# Altium PCB PCB1.PcbDoc (part 1 of 2)
Units mm, origin at the board's own origin, x right, y up, seen from the top; angles counter-clockwise.
Board outline 84.97 x 56 mm, 6 copper layers (Top Layer, L2_GND, L3-PWR, L4-SGN, L5-GND, Bottom Layer), stack 1.452 mm thick; 132 components, 108 nets, 851 pads, 433 vias.
Unrouted connection lines stored in the file: 212.
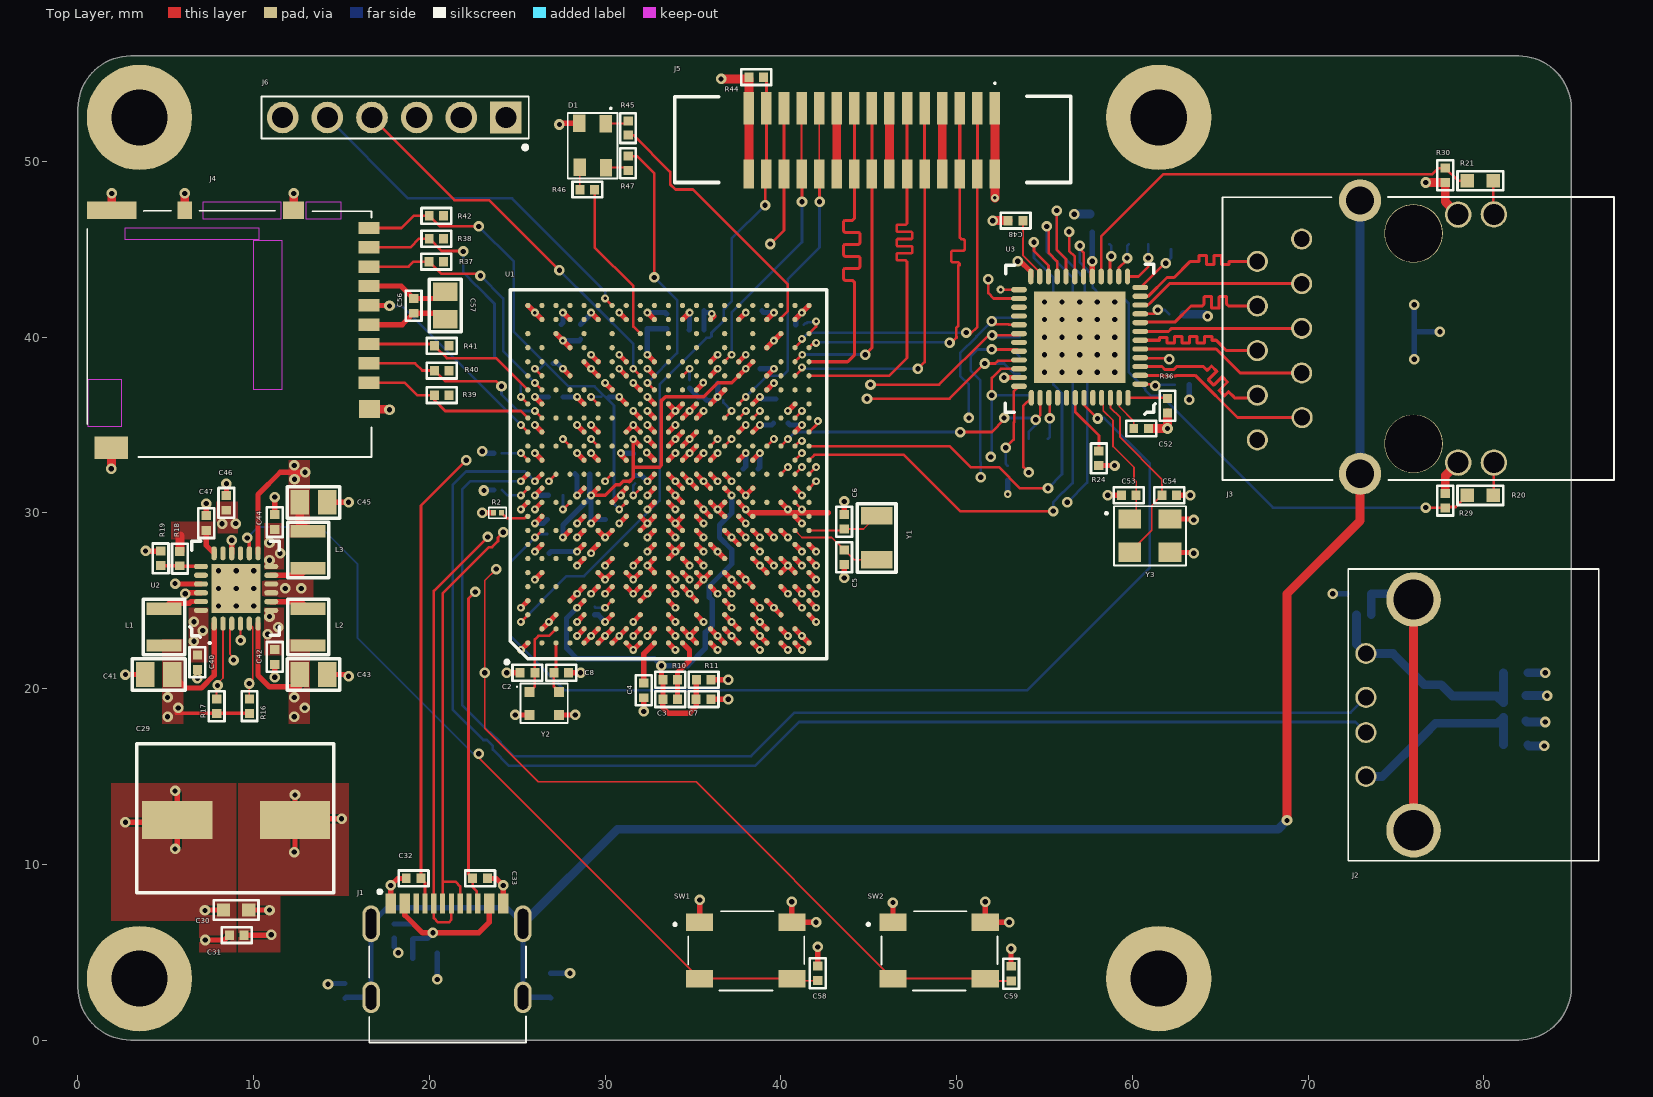
[diagram p0: Top Layer view]
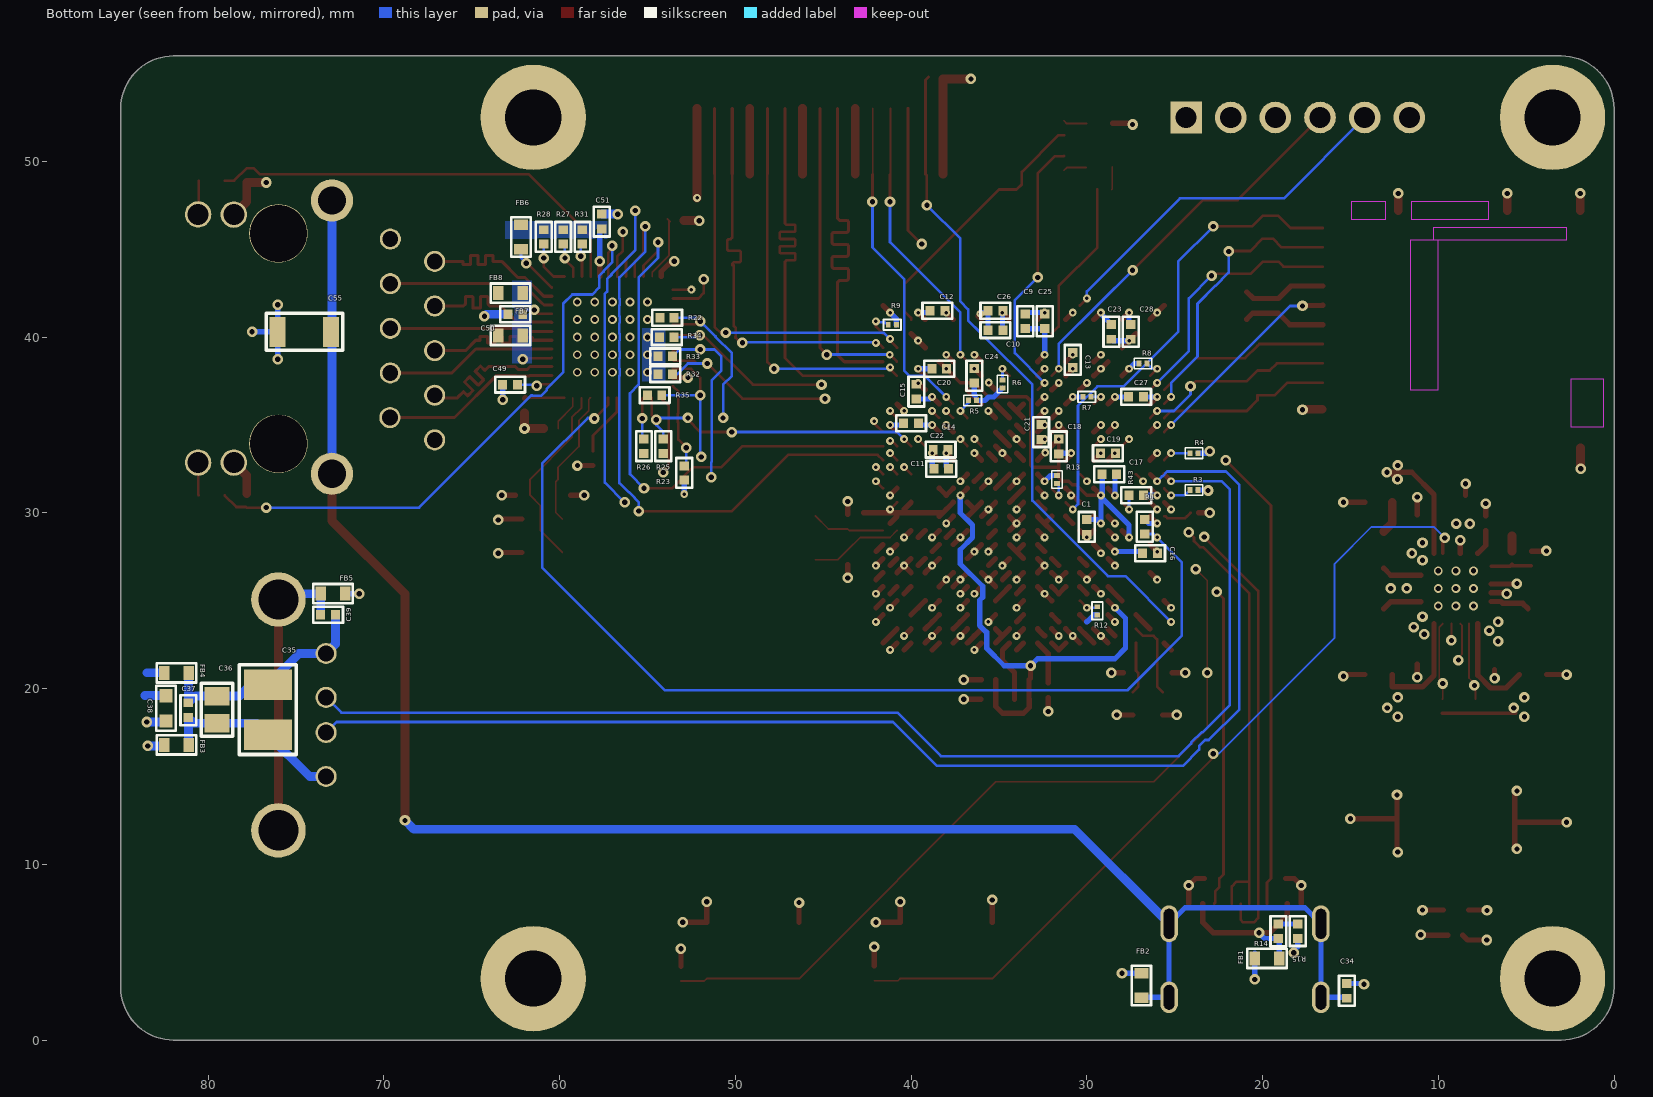
[diagram p1: Bottom Layer view, seen from below]
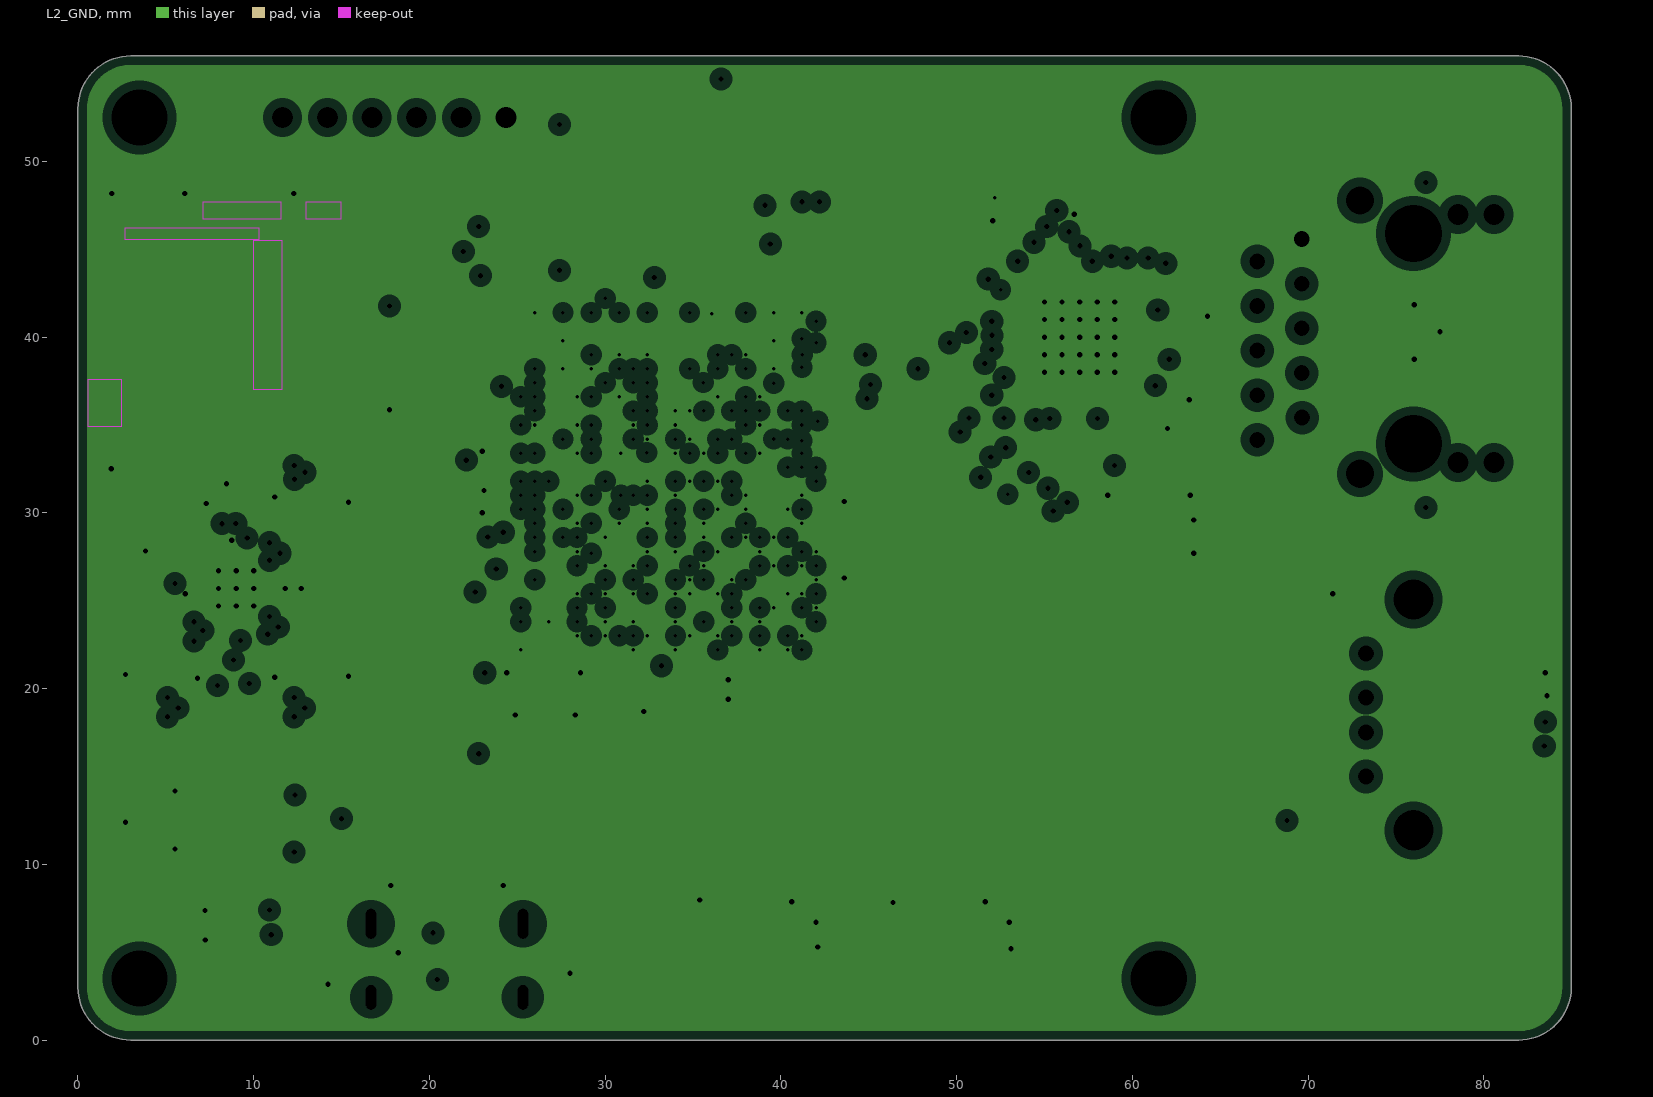
[diagram p2: L2_GND, clearances drawn from the general rule]
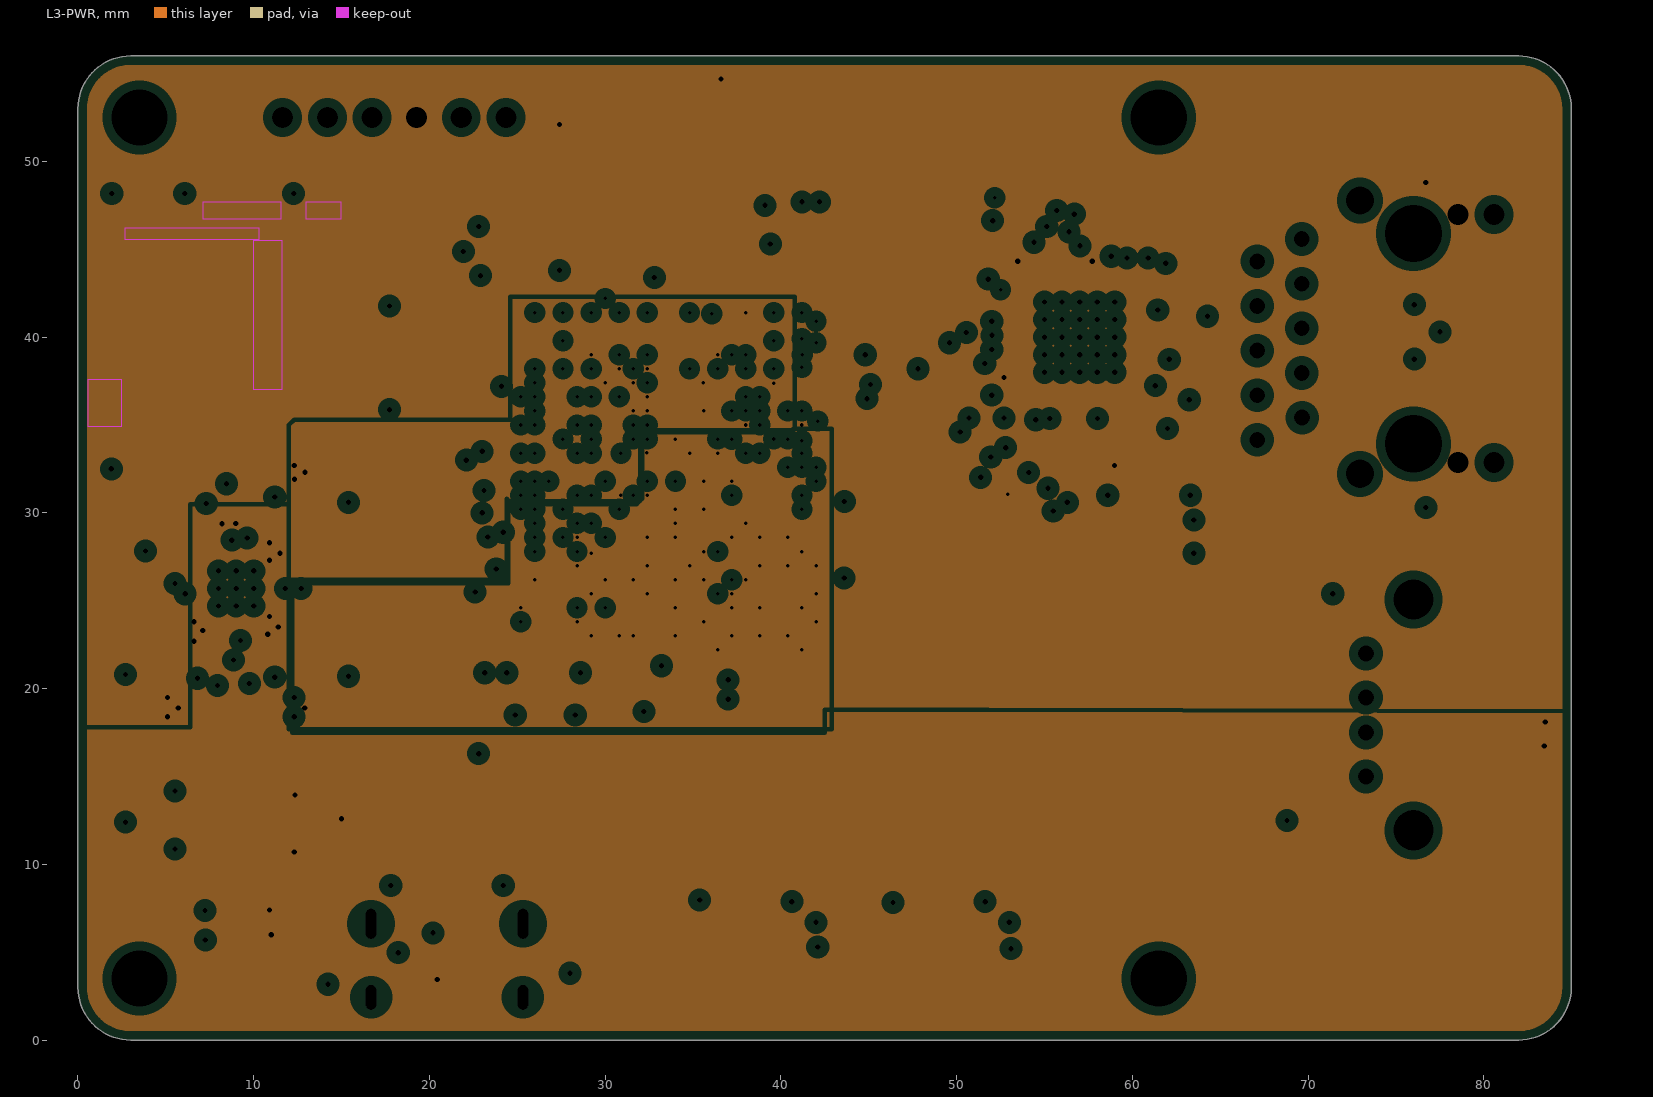
[diagram p3: L3-PWR, clearances drawn from the general rule]
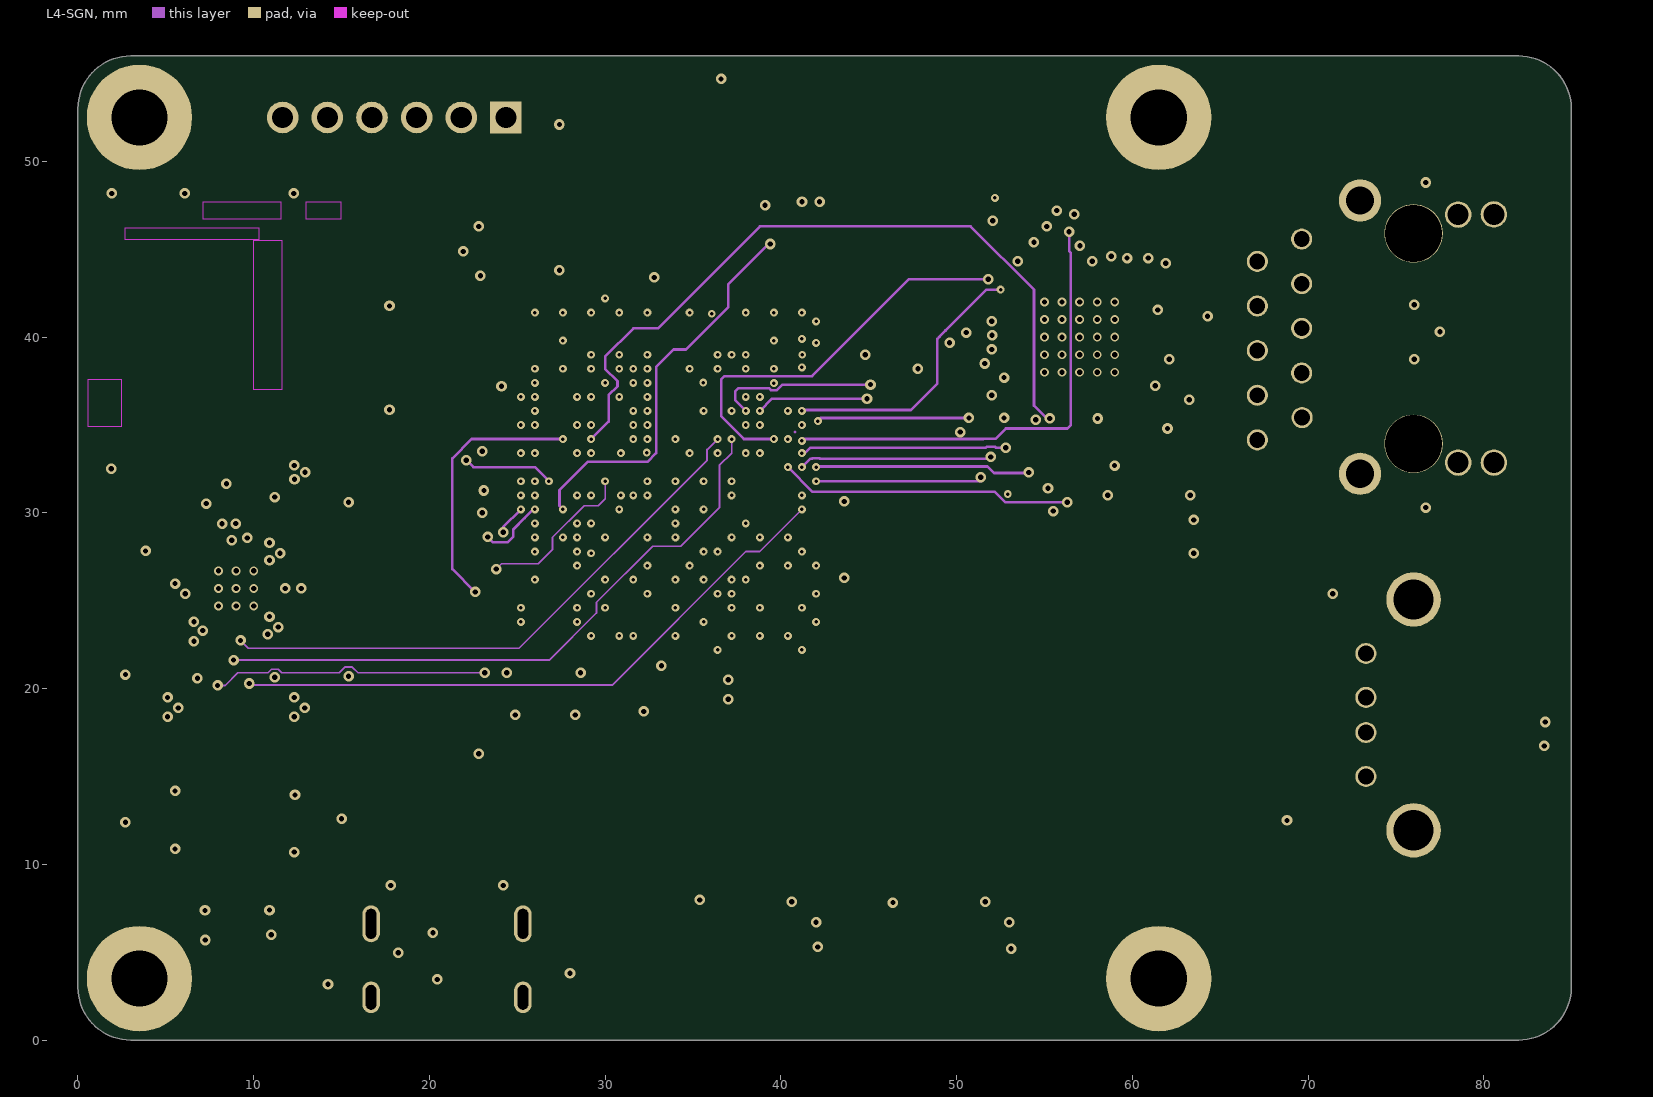
[diagram p4: L4-SGN]
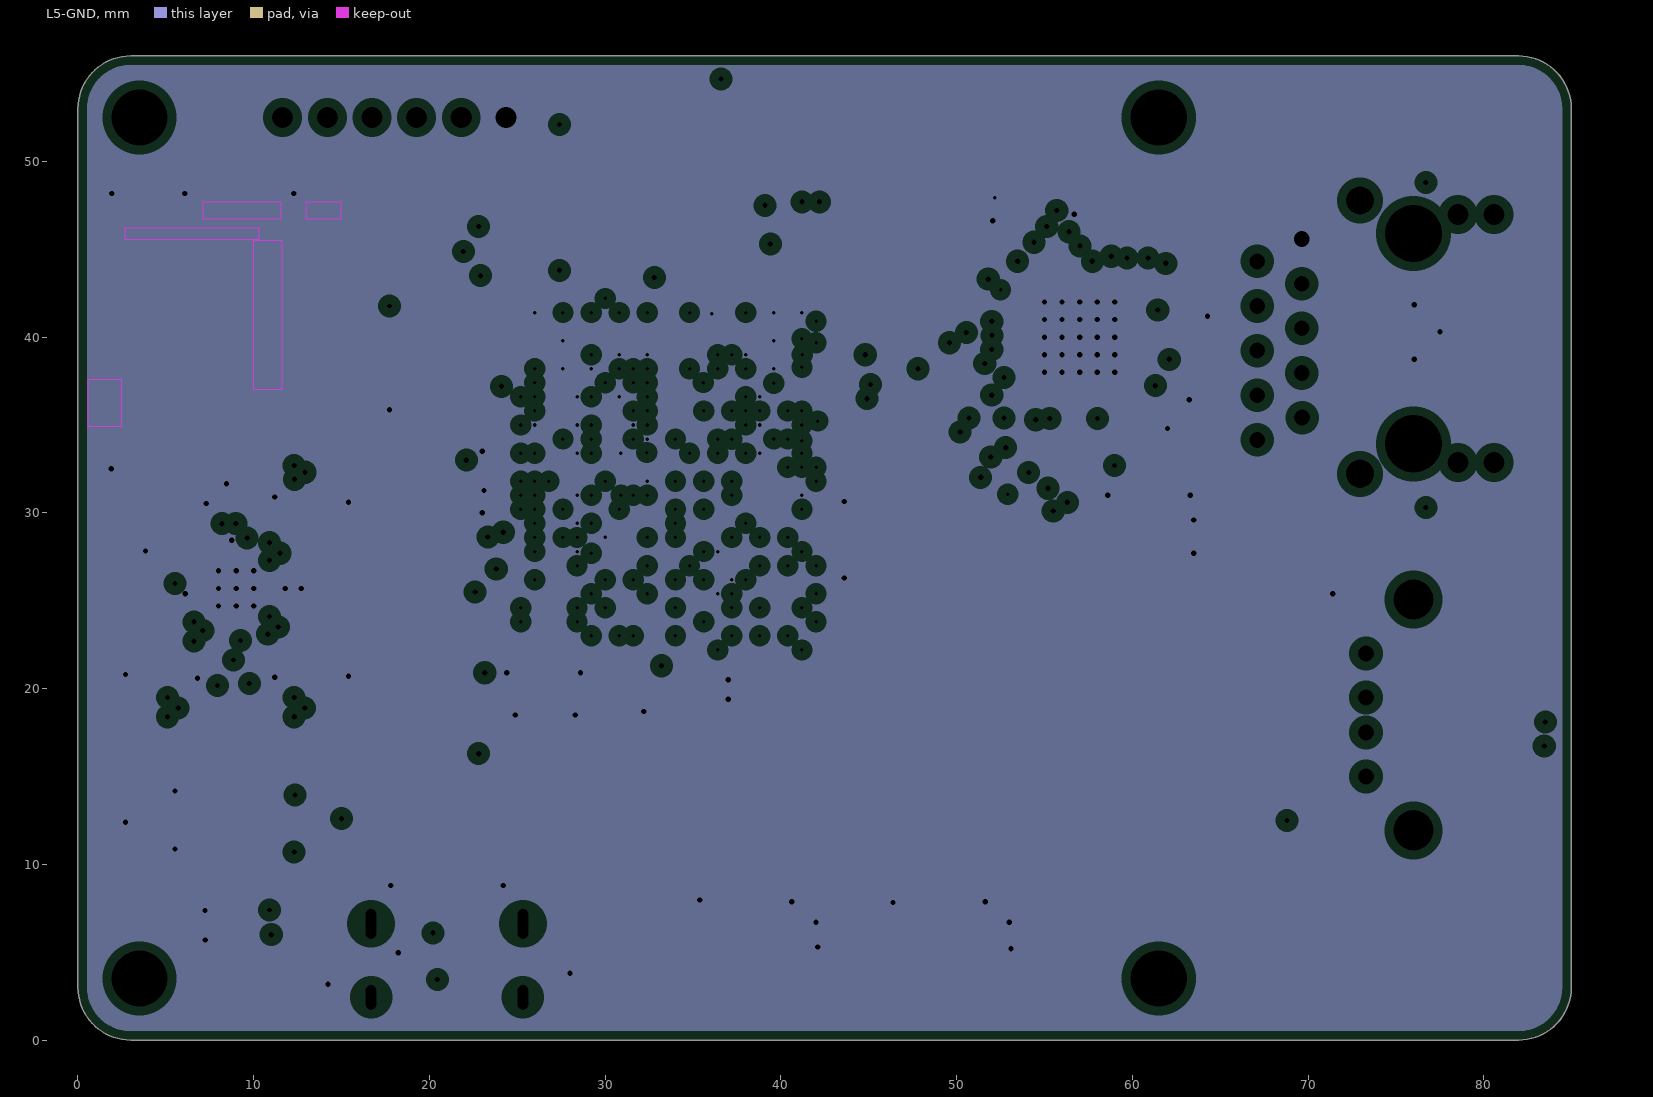
[diagram p5: L5-GND, clearances drawn from the general rule]
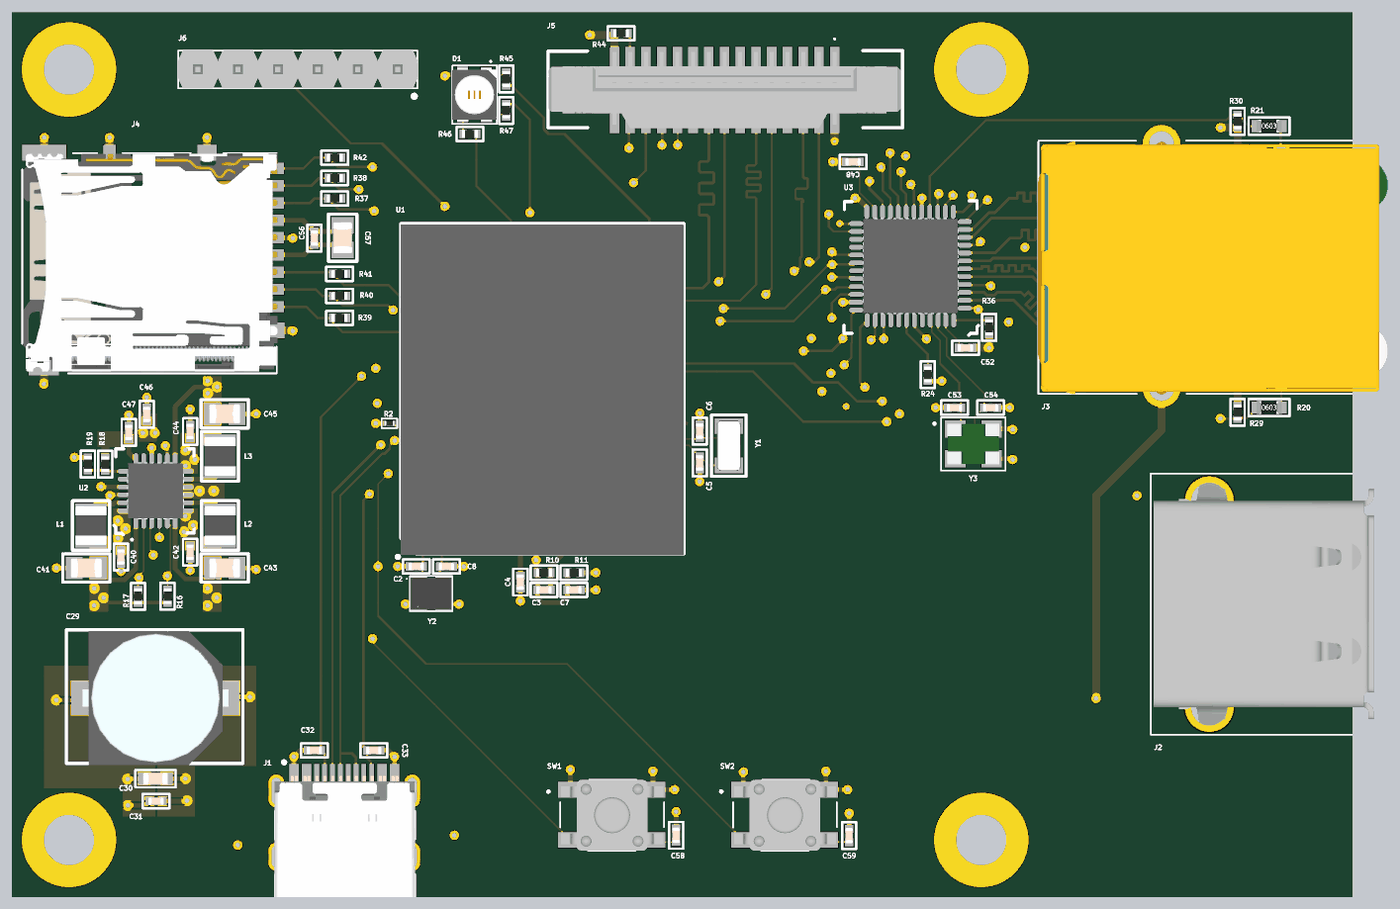
[diagram p7: 3D render of the assembled board from above, using the file's embedded part models]
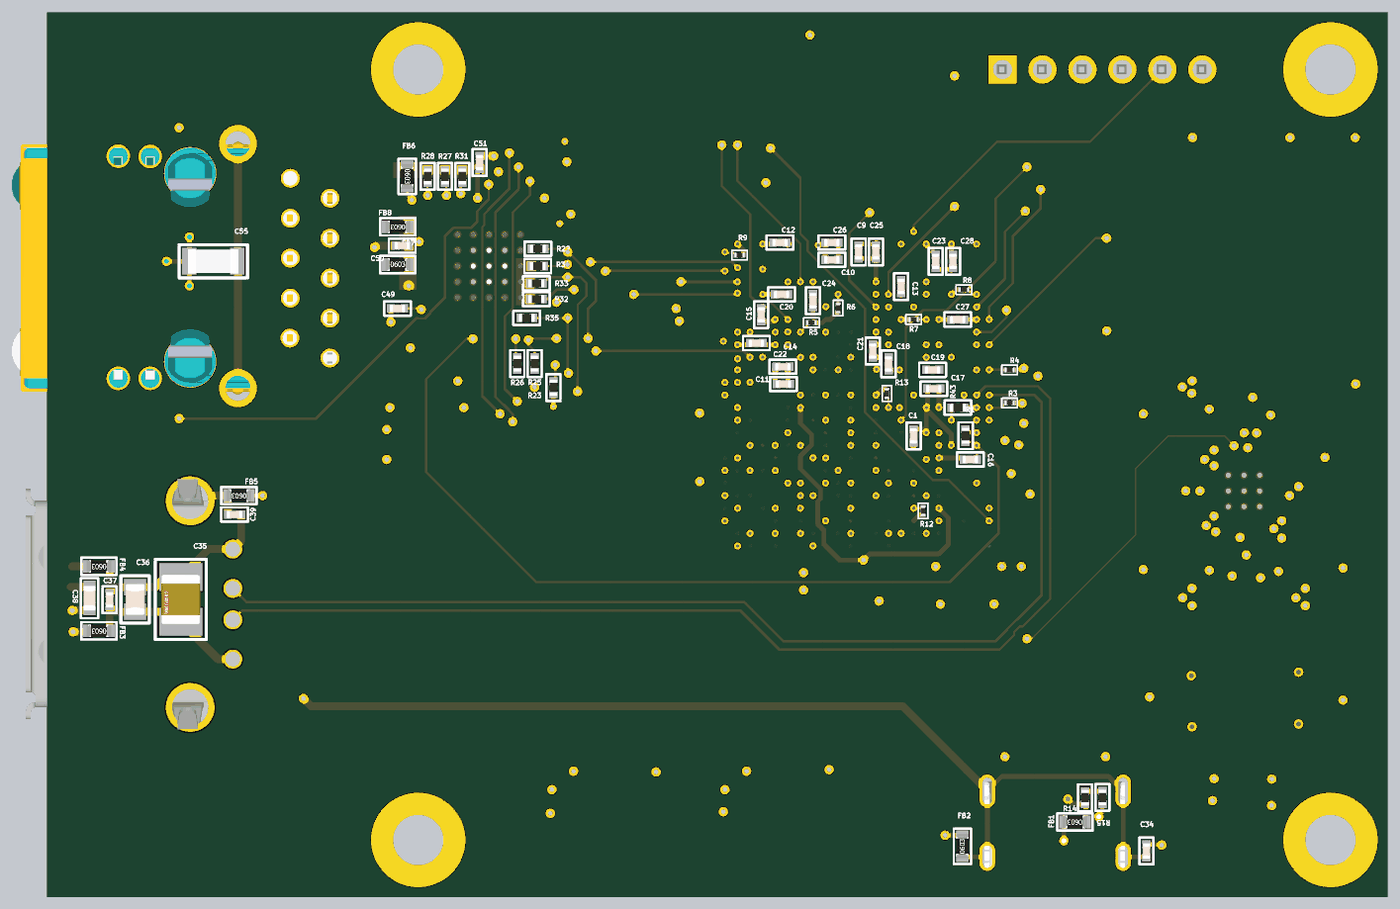
[diagram p8: 3D render of the assembled board from below, using the file's embedded part models]

## Layer stack, top to bottom
Top Solder: solder mask 0.01, Solder Resist, Dk 3.5
Top Layer: signal copper 0.035
Dielectric 1: prepreg 0.1, PP-006, Dk 4.1
L2_GND: plane copper 0.018, net GND
Dielectric 2: core 0.1, PP-006, Dk 4.1
L3-PWR: plane copper 0.018, net (Multiple Nets)
Dielectric 3: prepreg 0.1, PP-006, Dk 4.1
Dielectric 4: prepreg 0.1, PP-006, Dk 4.1
Dielectric 5: core 0.51, Core-009, Dk 4.5
Dielectric 6: dielectric 0.1, FR-4, Dk 4.8
Dielectric 7: prepreg 0.1, PP-006, Dk 4.1
L4-SGN: signal copper 0.018
Dielectric 8: core 0.1, PP-006, Dk 4.1
L5-GND: plane copper 0.018, net GND
Dielectric 9: prepreg 0.1, PP-006, Dk 4.1
Bottom Layer: signal copper 0.035
Bottom Solder: solder mask 0.01, Solder Resist, Dk 3.5

## Board outline
0,3 0,53 cw(c3,53) 3,56 81.975,56 cw(c81.975,53) 84.975,53 84.975,3 cw(c81.975,3) 81.975,0 3,0 cw(c3,3)

## Design rules (kind name [scope] priority, off if disabled: settings)
Clearance Clearance_BGA [InComponent('U1')] p1: gap=0.1 ignorepadtopadclearanceinfootprint=TRUE except(0.15: Arc-SMDPad Track-SMDPad; 0.2: Arc-Arc Arc-Track Track-Track)
Clearance Clearance_PWR_BGA [InNetClass('PWR_BGA')] p2: gap=0.1 ignorepadtopadclearanceinfootprint=TRUE except(0: Arc-Hole Track-Hole SMDPad-Hole THPad-Hole Via-Hole Fill-Hole Poly-Hole Region-Hole Text-Hole)
Clearance Clearance_DIFF [InNetClass('ETHERNET')] p3: gap=0.15 ignorepadtopadclearanceinfootprint=TRUE except(0: Arc-Hole Track-Hole SMDPad-Hole THPad-Hole Via-Hole Fill-Hole Poly-Hole Region-Hole Text-Hole; 0.1: Arc-Fill Arc-Poly Arc-Region Arc-Text Track-Fill Track-Poly Track-Region Track-Text THPad-Text Via-Text Fill-Text Poly-Text Region-Text Text-Text; 0.175: Arc-Arc Arc-Track Track-Track; 0.2: Arc-SMDPad Arc-Via Track-SMDPad Track-Via Via-Fill Via-Poly Via-Region; 0.4: SMDPad-SMDPad; 0.5: Via-Via)
Clearance [All] p4: gap=0.15 ignorepadtopadclearanceinfootprint=TRUE except(0: Arc-Hole Track-Hole SMDPad-Hole THPad-Hole Via-Hole Fill-Hole Poly-Hole Region-Hole Text-Hole; 0.1: Arc-Fill Arc-Poly Arc-Region Arc-Text Track-Fill Track-Poly Track-Region Track-Text THPad-Text Via-Text Fill-Text Poly-Text Region-Text Text-Text; 0.2: Arc-SMDPad Arc-Via Track-SMDPad Track-Via Via-Via; 0.3: Arc-Arc Arc-Track Track-Track; 0.4: SMDPad-SMDPad)
ComponentClearance [All] p1: gap=0 collisioncheckmode=3 verticalgap=0 showdistances=FALSE
DiffPairsRouting DiffPairsRouting_USB [InDifferentialPair('USBA')AND InDifferentialPair('USBB')] p1: maxlimit=0.254 minlimit=0.15 mostfreqgap=0.254 toplayer_maxgap=0.15 toplayer_prefgap=0.15 toplayer_minwidth=0.15 toplayer_maxwidth=0.15 toplayer_prefwidth=0.15 bottomlayer_maxgap=0.15 bottomlayer_prefgap=0.15 bottomlayer_minwidth=0.15 bottomlayer_maxwidth=0.15 bottomlayer_prefwidth=0.15 impedanceprofiledriven=TRUE impedanceprofileid={63E1278F-B7E8-4108-B0A6-4DE03EEFE164} impedanceprofilevalue=90.000000 maxuncoupledlength=12.7
DiffPairsRouting DiffPairsRouting_100 [InNetClass('ETHERNET') AND InNetClass('MIPI')] p2: maxlimit=0.175 minlimit=0.175 mostfreqgap=0.175 toplayer_minwidth=0.175 toplayer_maxwidth=0.175 toplayer_prefwidth=0.175 bottomlayer_minwidth=0.175 bottomlayer_maxwidth=0.175 bottomlayer_prefwidth=0.175 impedanceprofiledriven=TRUE impedanceprofileid={972886C7-724B-4E2D-BED4-EBAC2BD47916} impedanceprofilevalue=100.000000 maxuncoupledlength=12.7
FanoutControl Fanout_BGA [InComponent('U1')] p1: bgadir=Out bgaviamode=Centered fanoutstyle=BGA fanoutdirection=Alternating viagrid=0.025 // Fanout_BGA (Default Rule)
HoleSize [All] p1: absolutevalues=TRUE maxlimit=2.54 minlimit=0.015 maxpercent=80.000 minpercent=20.000
HoleToHoleClearance [All] p1: gap=0.2 allowstackedmicrovias=TRUE
MinimumSolderMaskSliver [All] p1: minsoldermaskwidth=0.05
PlaneClearance [All] p1: clearance=0.508
PlaneConnect [All] p1: planeconnectstyle=Relief reliefexpansion=0.2 reliefentries=4 reliefconductorwidth=0.1 reliefairgap=0.2
PolygonConnect [All] p1: connectstyle=Direct reliefconductorwidth=0.254 reliefentries=4 polygonreliefangle="90 Angle" airgapwidth=0.254
RoutingVias RoutingVias_BGA [InComponent('U1')] p1: holewidth=0.2 width=0.45 viastyle="Through Hole" minholewidth=0.2 minwidth=0.45 maxholewidth=0.2 maxwidth=0.45
RoutingVias [All] p2: holewidth=0.3 width=0.6 viastyle="Through Hole" minholewidth=0.2 minwidth=0.45 maxholewidth=0.3 maxwidth=0.6
SilkToSilkClearance [All] p1: silktosilkclearance=0.1
SilkToSolderMaskClearance [IsPad] p1: minsilkscreentomaskgap=0.1 clearancetoexposedcopper=TRUE
SolderMaskExpansion [All] p1: expansion=0.05 istentingtop=FALSE
SupplyNets "Schematic Supply Nets_15" [InNet('GND_USBB')] p1: voltage=0.000
SupplyNets "Schematic Supply Nets_14" [InNet('VDDAL_PLL')] p2: voltage=0.000
SupplyNets "Schematic Supply Nets_13" [InNet('VDDCORE')] p3: voltage=0.000
SupplyNets "Schematic Supply Nets_12" [InNet('VDD_2V5')] p4: voltage=0.000
SupplyNets "Schematic Supply Nets_11" [InNet('VDD_1V8')] p5: voltage=0.000
SupplyNets "Schematic Supply Nets_10" [InNet('5V_MAIN')] p6: voltage=0.000
SupplyNets "Schematic Supply Nets_9" [InNet('VDDAH')] p7: voltage=0.000
SupplyNets "Schematic Supply Nets_8" [InNet('USBB_VBUS_5V')] p8: voltage=0.000
SupplyNets "Schematic Supply Nets_7" [InNet('USBB_GND')] p9: voltage=0.000
SupplyNets "Schematic Supply Nets_6" [InNet('VDDIODDR')] p10: voltage=0.000
SupplyNets "Schematic Supply Nets_5" [InNet('VDDAL')] p11: voltage=0.000
SupplyNets "Schematic Supply Nets_4" [InNet('USBA_VBUS_5V')] p12: voltage=0.000
SupplyNets "Schematic Supply Nets_3" [InNet('DDR_VREF')] p13: voltage=0.000
SupplyNets "Schematic Supply Nets_2" [InNet('VDD_3V3')] p14: voltage=0.000
SupplyNets "Schematic Supply Nets_1" [InNet('GND_USBA')] p15: voltage=0.000
SupplyNets "Schematic Supply Nets" [InNet('GND')] p16: voltage=0.000
Width Width_SD [InNetClass('SD')] p1: maxlimit=0.15 minlimit=0.15 preferedwidth=0.15 impedanceprofiledriven=TRUE impedanceprofileid={80CB60DF-72BC-4233-9C1E-5B0B06726EB8} impedanceprofilevalue=50.000000 minimp=50.000000 maximp=50.000000 favimp=50.000000
Width Width_PWR_BGA [InNetClass('PWR_BGA')] p2: maxlimit=1 minlimit=0.3 preferedwidth=0.3
Width Witdth_BGA [InComponent('U1')] p3: maxlimit=0.15 minlimit=0.15 preferedwidth=0.15
Width Width_50R [InNetClass('GMAC')] p4: maxlimit=0.15 minlimit=0.15 preferedwidth=0.15
Width [All] p5: maxlimit=1 minlimit=0.1 preferedwidth=0.2
20 further rules are at their usual default settings.

## Classes and differential pairs
net class PWR_BGA: GND VDD_3V3 VDDCORE VDDIODDR
net class MIPI: MIPI_CK_N MIPI_CK_P MIPI_D0_N MIPI_D0_P MIPI_D1_N MIPI_D1_P
net class GMAC: GMAC0_IRQ GMAC0_MDC GMAC0_MDIO GMAC0_RX0 GMAC0_RX1 GMAC0_RX2 GMAC0_RX3 GMAC0_RXCK GMAC0_RXCTL GMAC0_TX0 GMAC0_TX1 GMAC0_TX2 GMAC0_TX3 GMAC0_TXEN GMACH0_TXCK
net class SD: SDMMC1_CD SDMMC1_CK SDMMC1_CMD SDMMC1_DAT0 SDMMC1_DAT1 SDMMC1_DAT2 SDMMC1_DAT3
net class ETHERNET: TXRX_A_N TXRX_A_P TXRX_B_N TXRX_B_P TXRX_C_N TXRX_C_P TXRX_D_N TXRX_D_P
component class USB: C29 C30 C31 C32 C33 C34 C35 C36 C37 C38 C39 FB2 FB3 FB4 FB5 J1 J2 R14 R15
component class SDCard-MIPI-User: C56 C57 C58 C59 D1 J4 J5 J6 R37 R38 R39 R40 R41 R42 R43 R44 R45 R46 R47 SW1 SW2
component class PMIC: C40 C41 C42 C43 C44 C45 C46 C47 L1 L2 L3 R16 R17 R18 R19 U2
component class MPU-System: C1 C2 C3 C4 C5 C6 C7 C8 R1 R2 R3 R4 R5 R6 R7 R8 R9 R10 R11 Y1 Y2
component class MPU-Power: C9 C10 C11 C12 C13 C14 C15 C16 C17 C18 C19 C20 C21 C22 C23 C24 C25 C26 C27 C28 R12 R13
component class MPU-PIO: U1
component class Ethernet: C48 C49 C50 C51 C52 C53 C54 C55 FB6 FB7 FB8 J3 R20 R21 R22 R23 R25 R26 R27 R28 R29 R30 R31 R32 R33 R34 R35 R36 U3 Y3
differential pair USBB: +USBB_P -USBB_N
differential pair USBA: +USBA_P -USBA_N
differential pair TXRX_D: +TXRX_D_P -TXRX_D_N
differential pair TXRX_C: +TXRX_C_P -TXRX_C_N
differential pair TXRX_B: +TXRX_B_P -TXRX_B_N
differential pair TXRX_A: +TXRX_A_P -TXRX_A_N
differential pair MIPI_D1: +MIPI_D1_P -MIPI_D1_N
differential pair MIPI_D0: +MIPI_D0_P -MIPI_D0_N
differential pair MIPI_CK: +MIPI_CK_P -MIPI_CK_N

## Components (designator, comment, footprint, x,y, rotation, side; value= is the part's Value field where it differs from the comment)
C1 "0.1uF" CAP0402 30,29.2 r90 bottom
C2 "10pF" CAP0402 25.58,20.9 r0 top
C3 "0.1uF" CAP0402 33.7,19.4 r0 top
C4 "4.7uF" CAP0402 32.2,19.9 r90 top
C5 "12pF" CAP0402 43.6,27.48 r90 top
C6 "12pF" CAP0402 43.6,29.5 r270 top
C7 "0.1uF" CAP0402 35.6,19.4 r180 top
C8 "10pF" CAP0402 27.5,20.9 r180 top
C9 "4.7uF" CAP0402 33.5,40.9 r90 bottom
C10 "4.7uF" CAP0402 35.2,40.4 r180 bottom
C11 "4.7uF" CAP0402 38.28,32.5 r180 bottom
C12 "4.7uF" CAP0402 38.5,41.5 r180 bottom
C13 "0.1uF" CAP0402 30.8,38.7 r270 bottom
C14 "0.1uF" CAP0402 38.32,33.6 r180 bottom
C15 "0.1uF" CAP0402 39.7,36.9 r90 bottom
C16 "0.1uF" CAP0402 26.4,27.7 r180 bottom
C17 "0.1uF" CAP0402 28.72,32.2 r0 bottom
C18 "2.2uF" CAP0402 31.6,33.78 r90 bottom
C19 "0.1uF" CAP0402 28.8,33.4 r0 bottom
C20 "0.1uF" CAP0402 38.4,38.2 r180 bottom
C21 "0.1uF" CAP0402 32.6,34.6 r90 bottom
C22 "0.1uF" CAP0402 40,35.1 r0 bottom
C23 "0.1uF" CAP0402 28.6,40.3 r90 bottom
C24 "0.1uF" CAP0402 36.4,37.8 r90 bottom
C25 "0.1uF" CAP0402 32.4,40.9 r90 bottom
C26 "0.1uF" CAP0402 35.2,41.5 r180 bottom
C27 "0.1uF" CAP0402 27.2,36.6 r180 bottom
C28 "0.1uF" CAP0402 27.5,40.3 r90 bottom
C29 "330uF" "CAP ALU" 9,12.5 r180 top
C30 "10uF" CAP0603 9,7.4 r0 top
C31 "0.1uF" CAP0402 9.036,5.971 r0 top
C32 "470pF" CAP0402 19.1,9.2 r0 top
C33 "470pF" CAP0402 22.88,9.2 r180 top
C34 "0.1uF" CAP0402 15.2,2.8 r270 bottom
C35 "100uF" CAP1210 76.6,18.8 r270 bottom
C36 "22uF" CAP0805 79.5,18.8 r270 bottom
C37 "0.1uF" CAP0402 81.125,18.775 r270 bottom
C38 "10uF" CAP0603 82.4,18.88 r270 bottom
C39 "0.1uF" CAP0402 73.18,24.2 r0 bottom
C40 "4.7uF" CAP0402 6.8,21.5 r90 top
C41 "22uF" CAP0805 4.6,20.8 r180 top
C42 "4.7uF" CAP0402 11.2,21.8 r90 top
C43 "22uF" CAP0805 13.4,20.8 r0 top
C44 "4.7uF" CAP0402 11.2,29.48 r270 top
C45 "22uF" CAP0805 13.4,30.6 r0 top
C46 "4.7uF" CAP0402 8.446,30.569 r270 top
C47 "4.7uF" CAP0402 7.3,29.42 r270 top
C48 "0.1uF" CAP0402 53.351,46.629 r0 top
C49 "0.1uF" CAP0402 62.82,37.3 r0 bottom
C50 "0.1uF" CAP0402 62.52,41.3 r0 bottom
C51 "0.1uF" CAP0402 57.6,46.58 r270 bottom
C52 "0.1uF" CAP0402 60.5,34.8 r0 top
C53 "10pF" CAP0402 59.8,31 r0 top
C54 "10pF" CAP0402 62.1,31 r0 top
C55 "1000pF" CAP1206 74.524,40.3 r180 bottom
C56 "0.1uF" CAP0402 19.1,41.78 r270 top
C57 "22uF" CAP0805 20.9,41.8 r270 top
C58 "2.2uF" CAP0402 42.1,3.8 r270 top
C59 "0.1uF" CAP0402 53.1,3.78 r270 top
D1 "APT1608SRCPRV" CLV1A-FKB-CK1VW1DE1BB7C3C3 29.5,51 r270 top
FB1 "120R" FB0603 19.75,4.65 r0 bottom
FB2 "120R" FB0603 26.9,3.1 r90 bottom
FB3 "120R" FB0603 81.8,16.8 r0 bottom
FB4 "120R" FB0603 81.8,20.9 r0 bottom
FB5 "120R" FB0603 72.9,25.4 r0 bottom
FB6 "120R" FB0603 62.2,45.7 r270 bottom
FB7 "120R" FB0603 62.8,40.1 r180 bottom
FB8 "120R" FB0603 62.8,42.5 r0 bottom
J1 "USB2.0 TYPE-C FEMALE" USB4105-GF-A 21,5.1 r0 top locked
J2 "USB2.0 STD-A FEMALE" 292303-1 79.345,18.5 r90 top locked
J3 "JXD1-0019NL" JXD1-0019NL 76,40 r90 top locked
J4 "DM3AT-SF-PEJM5" DM3AT-SF-PEJM5 9,40.46 r270 top
J5 "FPC 15P Female" 1-1734248-5_1 45,51 r0 top locked
J6 "HDR-2.54 Male 1x6" 68001-106HLF 18.05,52.5 r180 top locked
L1 "1.5uH" INDUCTOR1008 4.9,23.5 r270 top
L2 "1.5uH" INDUCTOR1008 13.1,23.5 r270 top
L3 "1.5uH" INDUCTOR1008 13.1,27.896 r90 top
R1 "10k" RES0402 26.7,29.21 r90 bottom
R2 "200R" RES0201 23.87,30 r180 top
R3 "200R" RES0201 23.9,31.3 r180 bottom
R4 "200R" RES0201 23.9,33.4 r180 bottom
R5 "16.9k" RES0201 36.5,36.4 r0 bottom
R6 "16.9k" RES0201 34.8,37.33 r90 bottom
R7 "16.9k" RES0201 30,36.6 r180 bottom
R8 "16.9k" RES0201 26.8,38.5 r180 bottom
R9 "4.02k" RES0201 41.07,40.7 r180 bottom
R10 "1k" RES0402 33.7,20.5 r0 top
R11 "1k" RES0402 35.6,20.5 r180 top
R12 "240R" RES0201 29.4,24.43 r270 bottom
R13 "240R" RES0201 31.7,31.9 r270 bottom
R14 "10k" RES0402 19.1,6.19 r270 bottom
R15 "20k" RES0402 18,6.2 r90 bottom
R16 "10k" RES0402 9.761,19.003 r270 top
R17 "10k" RES0402 7.885,18.995 r270 top
R18 "47k" RES0402 5.8,27.4 r90 top
R19 "47k" RES0402 4.7,27.41 r90 top
R20 "330R" RES0603 79.8,31 r0 top
R21 "330R" RES0603 79.8,48.9 r0 top
R22 "10k" RES0402 53.89,41.1 r0 bottom
R23 "10k" RES0402 52.907,32.27 r270 bottom
R24 "10k" RES0402 58.1,33.1 r270 top
R25 "1k" RES0402 54.1,33.8 r270 bottom
R26 "10k" RES0402 55.2,33.8 r270 bottom
R27 "10k" RES0402 59.8,45.7 r90 bottom
R28 "10k" RES0402 60.9,45.7 r90 bottom
R29 "10k" RES0402 77.8,30.7 r90 top
R30 "10k" RES0402 77.8,49.21 r270 top
R31 "10k" RES0402 58.7,45.7 r90 bottom
R32 "1k" RES0402 53.99,37.9 r180 bottom
R33 "1k" RES0402 53.99,38.9 r180 bottom
R34 "1k" RES0402 53.9,40 r180 bottom
R35 "1k" RES0402 54.6,36.7 r180 bottom
R36 "6.04k" RES0402 62,36.1 r90 top
R37 "47k" RES0402 20.39,44.3 r0 top
R38 "47k" RES0402 20.4,45.6 r0 top
R39 "47k" RES0402 20.7,36.7 r0 top
R40 "47k" RES0402 20.7,38.1 r0 top
R41 "47k" RES0402 20.7,39.5 r0 top
R42 "10k" RES0402 20.4,46.9 r0 top
R43 "2.2k" RES0402 27.19,31 r0 bottom
R44 "2.2k" RES0402 38.6,54.8 r0 top
R45 "1k" RES0402 31.3,51.9 r90 top
R46 "1k" RES0402 28.99,48.4 r180 top
R47 "1k" RES0402 31.3,49.9 r270 top
SW1 "PTS647" "PTS 647 SK38 SMTR2 LFS" 38,5.1 r0 top locked
SW2 "PTS647" "PTS 647 SK38 SMTR2 LFS" 49,5.1 r0 top locked
U1 "SAMA7G54DG-I/4UB" BGA427C80P25X21_2100X1800X120 33.6,32.2 r90 top locked
U2 "MCP16501TA-E/RMB" QFN-24 9,25.7 r90 top locked
U3 "LAN8840-V/PSA" QFN-48 57,40 r180 top locked
Y1 "32.768kHZ" VMK4-1EE-12-32K7680000TR 45.4,28.6 r90 top
Y2 "24MHz" VXM8-9016-24M0000000 26.534,19.152 r0 top
Y3 "50MHz" VXM7-1362-50M0000000 61,28.7 r0 top

## Footprints (in the part's own frame and the unit in brackets; to place one, negate y for a bottom-side part, rotate by r counter-clockwise, add the part's x,y. Pads: shape width x height; smd on the part's side, far side on the other; paste and mask are expansions set on the pad)
1-1734248-5_1 [mm] "CON FPC 1mm 15P Female SMD VERT"
  rect 0.6x1.65 smd: 1(7.178,-1.728) 2(6.178,-1.728) 3(5.178,-1.728) 4(4.178,-1.728) 5(3.178,-1.728) 6(2.178,-1.728) 7(1.178,-1.728) 8(0.178,-1.728) 9(-0.822,-1.728) 10(-1.822,-1.728) 11(-2.822,-1.728) 12(-3.822,-1.728) 13(-4.822,-1.728) 14(-5.822,-1.728) 15(-6.822,-1.728)
  rect 0.6x1.85 smd: 1(7.178,2.023) 2(6.178,2.023) 3(5.178,2.023) 4(4.178,2.023) 5(3.178,2.023) 6(2.178,2.023) 7(1.178,2.023) 8(0.178,2.023) 9(-0.822,2.023) 10(-1.822,2.023) 11(-2.822,2.023) 12(-3.822,2.023) 13(-4.822,2.023) 14(-5.822,2.023) 15(-6.822,2.023)
  silkscreen extent -11.05,-2.2 11.5,3.5, body extent -11.02,-2.24 11.38,2.61, height 5.68
68001-106HLF [mm]
  rect 1.8x1.8 hole 1.2: 1(-6.3,0)
  round 1.8 hole 1.2: 2(-3.76,0) 3(-1.22,0) 4(1.32,0) 5(3.86,0) 6(6.4,0)
  silkscreen extent -7.6,-1.2 7.6,1.8, body extent -7.62,-1.21 7.62,1.2, height 8.18
292303-1 [mm]
  round 3.1 hole 2.3 mask+0.1: 0(-6.57,3.345) 0(6.57,3.345)
  round 1.2 hole 0.92 mask+0.1: 1(-3.5,6.055) 2(-1,6.055) 3(1,6.055) 4(3.5,6.055)
  silkscreen extent -8.3,-7.2 8.3,7.06, body extent -8.12,-7.1 8.12,6.9, height 8.62
BGA427C80P25X21_2100X1800X120 [mm]
  round 0.3 smd mask+0.05: A1(-9.6,8) A3(-8,8) A4(-7.2,8) A5(-6.4,8) A6(-5.6,8) A7(-4.8,8) A8(-4,8) A9(-3.2,8) A10(-2.4,8) A11(-1.6,8) A12(-0.8,8) A13(0,8) A14(0.8,8) A15(1.6,8) A16(2.4,8) A17(3.2,8) A18(4,8) A19(4.8,8) A20(5.6,8) A21(6.4,8) A22(7.2,8) A23(8,8) A25(9.6,8) AA1(-9.6,-8) AA3(-8,-8) AA4(-7.2,-8) AA5(-6.4,-8) AA6(-5.6,-8) AA7(-4.8,-8) AA8(-4,-8) AA9(-3.2,-8) AA10(-2.4,-8) AA11(-1.6,-8) AA12(-0.8,-8) AA13(0,-8) AA14(0.8,-8) AA15(1.6,-8) AA16(2.4,-8) AA17(3.2,-8) AA18(4,-8) AA19(4.8,-8) AA20(5.6,-8) AA21(6.4,-8) AA22(7.2,-8) AA23(8,-8) AA25(9.6,-8) B1(-9.6,7.2) B2(-8.8,7.2) B4(-7.2,7.2) B5(-6.4,7.2) B6(-5.6,7.2) B7(-4.8,7.2) B8(-4,7.2) B9(-3.2,7.2) B10(-2.4,7.2) B11(-1.6,7.2) B12(-0.8,7.2) B13(0,7.2) B14(0.8,7.2) B15(1.6,7.2) B16(2.4,7.2) B17(3.2,7.2) B18(4,7.2) B19(4.8,7.2) B20(5.6,7.2) B21(6.4,7.2) B22(7.2,7.2) B24(8.8,7.2) B25(9.6,7.2) C1(-9.6,6.4) C2(-8.8,6.4) C3(-8,6.4) C5(-6.4,6.4) C7(-4.8,6.4) C9(-3.2,6.4) C11(-1.6,6.4) C13(0,6.4) C15(1.6,6.4) C17(3.2,6.4) C19(4.8,6.4) C21(6.4,6.4) C23(8,6.4) C24(8.8,6.4) C25(9.6,6.4) D1(-9.6,5.6) D2(-8.8,5.6) D4(-7.2,5.6) D7(-4.8,5.6) D9(-3.2,5.6) D11(-1.6,5.6) D13(0,5.6) D15(1.6,5.6) D17(3.2,5.6) D19(4.8,5.6) D20(5.6,5.6) D22(7.2,5.6) D24(8.8,5.6) D25(9.6,5.6) E1(-9.6,4.8) E2(-8.8,4.8) E3(-8,4.8) E4(-7.2,4.8) E5(-6.4,4.8) E7(-4.8,4.8) E8(-4,4.8) E9(-3.2,4.8) E10(-2.4,4.8) E11(-1.6,4.8) E12(-0.8,4.8) E13(0,4.8) E14(0.8,4.8) E15(1.6,4.8) E16(2.4,4.8) E17(3.2,4.8) E18(4,4.8) E19(4.8,4.8) E21(6.4,4.8) E22(7.2,4.8) E23(8,4.8) E24(8.8,4.8) E25(9.6,4.8) F1(-9.6,4) F2(-8.8,4) F5(-6.4,4) F6(-5.6,4) F8(-4,4) F9(-3.2,4) F10(-2.4,4) F11(-1.6,4) F12(-0.8,4) F13(0,4) F14(0.8,4) F15(1.6,4) F16(2.4,4) F17(3.2,4) F18(4,4) F20(5.6,4) F21(6.4,4) F24(8.8,4) F25(9.6,4) G1(-9.6,3.2) G2(-8.8,3.2) G3(-8,3.2) G4(-7.2,3.2) G5(-6.4,3.2) G6(-5.6,3.2) G7(-4.8,3.2) G9(-3.2,3.2) G11(-1.6,3.2) G13(0,3.2) G15(1.6,3.2) G17(3.2,3.2) G19(4.8,3.2) G20(5.6,3.2) G21(6.4,3.2) G22(7.2,3.2) G23(8,3.2) G24(8.8,3.2) G25(9.6,3.2) H1(-9.6,2.4) H2(-8.8,2.4) H5(-6.4,2.4) H6(-5.6,2.4) H8(-4,2.4) H10(-2.4,2.4) H11(-1.6,2.4) H12(-0.8,2.4) H13(0,2.4) H14(0.8,2.4) H15(1.6,2.4) H16(2.4,2.4) H18(4,2.4) H20(5.6,2.4) H21(6.4,2.4) H24(8.8,2.4) H25(9.6,2.4) J1(-9.6,1.6) J2(-8.8,1.6) J3(-8,1.6) J4(-7.2,1.6) J5(-6.4,1.6) J6(-5.6,1.6) J7(-4.8,1.6) J9(-3.2,1.6) J10(-2.4,1.6) J11(-1.6,1.6) J12(-0.8,1.6) J13(0,1.6) J14(0.8,1.6) J15(1.6,1.6) J16(2.4,1.6) J17(3.2,1.6) J18(4,1.6) J19(4.8,1.6) J20(5.6,1.6) J21(6.4,1.6) J22(7.2,1.6) J23(8,1.6) J24(8.8,1.6) J25(9.6,1.6) K1(-9.6,0.8) K2(-8.8,0.8) K5(-6.4,0.8) K6(-5.6,0.8) K7(-4.8,0.8) K8(-4,0.8) K9(-3.2,0.8) K10(-2.4,0.8) K11(-1.6,0.8) K12(-0.8,0.8) K13(0,0.8) K14(0.8,0.8) K15(1.6,0.8) K16(2.4,0.8) K17(3.2,0.8) K18(4,0.8) K19(4.8,0.8) K20(5.6,0.8) K21(6.4,0.8) K24(8.8,0.8) K25(9.6,0.8) L1(-9.6,0) L2(-8.8,0) L3(-8,0) L4(-7.2,0) L5(-6.4,0) L6(-5.6,0) L7(-4.8,0) L8(-4,0) L9(-3.2,0) L10(-2.4,0) L11(-1.6,0) L12(-0.8,0) L13(0,0) L14(0.8,0) L15(1.6,0) L16(2.4,0) L17(3.2,0) L18(4,0) L19(4.8,0) L20(5.6,0) L21(6.4,0) L22(7.2,0) L23(8,0) L24(8.8,0) L25(9.6,0) M1(-9.6,-0.8) M2(-8.8,-0.8) M5(-6.4,-0.8) M6(-5.6,-0.8) M7(-4.8,-0.8) M8(-4,-0.8) M9(-3.2,-0.8) M10(-2.4,-0.8) M11(-1.6,-0.8) M12(-0.8,-0.8) M13(0,-0.8) M14(0.8,-0.8) M15(1.6,-0.8) M16(2.4,-0.8) M17(3.2,-0.8) M18(4,-0.8) M19(4.8,-0.8) M20(5.6,-0.8) M21(6.4,-0.8) M24(8.8,-0.8) M25(9.6,-0.8) N1(-9.6,-1.6) N2(-8.8,-1.6) N3(-8,-1.6) N4(-7.2,-1.6) N5(-6.4,-1.6) N6(-5.6,-1.6) N7(-4.8,-1.6) N8(-4,-1.6) N9(-3.2,-1.6) N10(-2.4,-1.6) N11(-1.6,-1.6) N12(-0.8,-1.6) N13(0,-1.6) N14(0.8,-1.6) N15(1.6,-1.6) N16(2.4,-1.6) N17(3.2,-1.6) N18(4,-1.6) N19(4.8,-1.6) N20(5.6,-1.6) N21(6.4,-1.6) N22(7.2,-1.6) N23(8,-1.6) N24(8.8,-1.6) N25(9.6,-1.6) P1(-9.6,-2.4) P2(-8.8,-2.4) P5(-6.4,-2.4) P6(-5.6,-2.4) P8(-4,-2.4) P10(-2.4,-2.4) P11(-1.6,-2.4) P12(-0.8,-2.4) P13(0,-2.4) P14(0.8,-2.4) P15(1.6,-2.4) P16(2.4,-2.4) P18(4,-2.4) P20(5.6,-2.4) P21(6.4,-2.4) P24(8.8,-2.4) P25(9.6,-2.4) R1(-9.6,-3.2) R2(-8.8,-3.2) R3(-8,-3.2) R4(-7.2,-3.2) R5(-6.4,-3.2) R6(-5.6,-3.2) R7(-4.8,-3.2) R9(-3.2,-3.2) R10(-2.4,-3.2) R11(-1.6,-3.2) R12(-0.8,-3.2) R13(0,-3.2) R15(1.6,-3.2) R17(3.2,-3.2) R19(4.8,-3.2) R20(5.6,-3.2) R21(6.4,-3.2) R22(7.2,-3.2) R23(8,-3.2) R24(8.8,-3.2) R25(9.6,-3.2) T1(-9.6,-4) T2(-8.8,-4) T5(-6.4,-4) T6(-5.6,-4) T8(-4,-4) T9(-3.2,-4) T10(-2.4,-4) T11(-1.6,-4) T12(-0.8,-4) T13(0,-4) T14(0.8,-4) T15(1.6,-4) T16(2.4,-4) T17(3.2,-4) T18(4,-4) T20(5.6,-4) T21(6.4,-4) T24(8.8,-4) T25(9.6,-4) U1(-9.6,-4.8) U2(-8.8,-4.8) U3(-8,-4.8) U4(-7.2,-4.8) U5(-6.4,-4.8) U7(-4.8,-4.8) U8(-4,-4.8) U9(-3.2,-4.8) U10(-2.4,-4.8) U11(-1.6,-4.8) U12(-0.8,-4.8) U13(0,-4.8) U14(0.8,-4.8) U15(1.6,-4.8) U16(2.4,-4.8) U17(3.2,-4.8) U18(4,-4.8) U19(4.8,-4.8) U21(6.4,-4.8) U22(7.2,-4.8) U23(8,-4.8) U24(8.8,-4.8) U25(9.6,-4.8) V1(-9.6,-5.6) V2(-8.8,-5.6) V4(-7.2,-5.6) V6(-5.6,-5.6) V7(-4.8,-5.6) V9(-3.2,-5.6) V11(-1.6,-5.6) V13(0,-5.6) V15(1.6,-5.6) V17(3.2,-5.6) V19(4.8,-5.6) V20(5.6,-5.6) V22(7.2,-5.6) V24(8.8,-5.6) V25(9.6,-5.6) W1(-9.6,-6.4) W2(-8.8,-6.4) W3(-8,-6.4) W5(-6.4,-6.4) W6(-5.6,-6.4) W7(-4.8,-6.4) W9(-3.2,-6.4) W11(-1.6,-6.4) W13(0,-6.4) W15(1.6,-6.4) W17(3.2,-6.4) W19(4.8,-6.4) W20(5.6,-6.4) W21(6.4,-6.4) W23(8,-6.4) W24(8.8,-6.4) W25(9.6,-6.4) Y1(-9.6,-7.2) Y2(-8.8,-7.2) Y4(-7.2,-7.2) Y5(-6.4,-7.2) Y6(-5.6,-7.2) Y7(-4.8,-7.2) Y8(-4,-7.2) Y9(-3.2,-7.2) Y10(-2.4,-7.2) Y11(-1.6,-7.2) Y12(-0.8,-7.2) Y13(0,-7.2) Y14(0.8,-7.2) Y15(1.6,-7.2) Y16(2.4,-7.2) Y17(3.2,-7.2) Y18(4,-7.2) Y19(4.8,-7.2) Y20(5.6,-7.2) Y21(6.4,-7.2) Y22(7.2,-7.2) Y24(8.8,-7.2) Y25(9.6,-7.2)
  silkscreen extent -10.79,-9 10.5,9.29, body extent -10.56,-8.99 10.44,9.01, height 1.2
CAP0402 [mm]
  rect 0.51x0.535 smd mask+0.05: 1(-0.42,0) 2(0.42,0)
  silkscreen extent -0.85,-0.45 0.85,0.45, body extent -0.51,-0.25 0.51,0.25, height 0.51
CAP0603 [mm]
  rect 0.76x0.76 smd mask+0.05: 1(-0.72,0) 2(0.72,0)
  silkscreen extent -1.27,-0.55 1.28,0.55, body extent -0.8,-0.4 0.8,0.4, height 0.8
CAP0805 [mm]
  rect 1.05x1.4 smd mask+0.05: 1(-0.775,0) 2(0.775,0)
  silkscreen extent -1.5,-0.9 1.5,0.9, body extent -1,-0.62 1,0.63, height 1.26
CAP1206 [mil]
  rect 35.98x67.01 smd mask+1.97: 1(-60,0) 2(60,0)
  silkscreen extent -86,-41 86,41, body extent -63,-31 63,31, height 65
CAP1210 [mm]
  rect 1.75x2.75 smd paste+0 mask+0.102: 1(-1.425,0) 2(1.425,0)
  silkscreen extent -2.55,-1.62 2.55,1.62, body extent -1.6,-1.25 1.6,1.25, height 2.8
"CAP ALU" [mm]
  rect 4x2.15 smd: 1(-3.35,-0.025) 2(3.35,-0.025)
  silkscreen extent -5.56,-4.37 5.66,4.12, body extent -4.65,-4.28 4.65,4.22, height 10.5
CLV1A-FKB-CK1VW1DE1BB7C3C3 [mm]
  rect 1x0.7 smd mask+0.05: 1(-1.15,0.525) 2(-1.175,-0.975) 3(1.325,-0.95) 4(1.35,0.55)
  silkscreen extent -2.07,-1.63 1.97,1.2, body extent -1.65,-1.63 1.85,1.17, height 2.1
DM3AT-SF-PEJM5 [mm]
  rect 1x1.2 smd: G1(-6.75,3.275) G5(4.55,7.6)
  rect 1x0.8 smd: G2(-6.75,-2.925)
  rect 1x2.8 smd: G3(-6.75,-7.075)
  rect 0.7x1.2 smd: G4(-5.75,7.572) P1(3.05,7.572) P2(1.95,7.572) P3(0.85,7.572) P4(-0.25,7.572) P5(-1.35,7.572) P6(-2.45,7.572) P7(-3.55,7.572) P8(-4.65,7.572)
  rect 1.3x1.9 smd: G6(6.75,-7.1)
  Keep-Out Layer region: 2.85,-6.525 5.55,-6.525 5.55,-8.425 2.85,-8.425
  Keep-Out Layer region: -5.777,1.3 -5.073,1.3 -5.073,-6.3 -5.777,-6.3
  Keep-Out Layer region: -5.065,2.575 -5.039,2.6 3.45,2.6 3.45,1 3.114,1 -5.065,1
  Keep-Out Layer region: -7.241,5.966 -6.25,5.966 -6.25,4.003 -7.241,3.997
  Keep-Out Layer region: -7.245,2.55 -6.255,2.55 -6.255,-1.87 -7.245,-1.87
  silkscreen extent -6.74,-8.47 7.29,7.7, body extent -6.72,-8.4 7.22,7.75, height 1.64
FB0603 [mm]
  rect 0.6x0.8 smd mask+0.05: 1(-0.7,0) 2(0.7,0)
  silkscreen extent -1.12,-0.55 1.12,0.55, body extent -0.8,-0.4 0.8,0.4, height 0.46
INDUCTOR1008 [mm]
  rect 0.7x2 smd mask+0.05: 1(-1.05,0) 2(1.05,0)
  silkscreen extent -1.57,-1.17 1.58,1.18, body extent -1.25,-1 1.25,1, height 1.2
JXD1-0019NL [mm]
  round 2.4 hole 1.6 mask+0.05: 0(-7.775,3.039) 0(7.775,3.039)
  round 1.2 hole 0.9 mask+0.05: 1(5.582,6.364) 2(4.312,8.889) 3(3.042,6.364) 4(1.772,8.889) 5(0.502,6.364) 6(-0.768,8.889) 7(-2.038,6.364) 8(-3.308,8.889) 9(-4.578,6.339) 10(-5.848,8.889)
  round 1.5 hole 1.2 mask+0.05: 11(6.972,-2.541) 12(6.987,-4.571) 13(-7.138,-2.541) 14(-7.138,-4.571)
  round 3.33 hole 3.25 unplated mask+0.05: ""(-6.068,-0.001) ""(5.902,-0.001)
  silkscreen extent -8.13,-11.41 7.98,10.87, body extent -8.15,-11.36 7.9,10.89, height 13.7
"PTS 647 SK38 SMTR2 LFS" [mm]
  rect 1.55x1 smd mask+0.05: 1(-2.625,1.6) 2(2.625,1.6) 3(-2.625,-1.6) 4(2.625,-1.6)
  silkscreen extent -4.08,-2.28 3.32,2.23, body extent -3.22,-2.28 3.28,2.22, height 3.8
QFN-24 [mm]
  oval 0.8x0.3 smd mask+0.05: 1(-2,1.25) 2(-2,0.75) 3(-2,0.25) 4(-2,-0.25) 5(-2,-0.75) 6(-2,-1.25) 13(2,-1.25) 14(2,-0.75) 15(2,-0.25) 16(2,0.25) 17(2,0.75) 18(2,1.25)
  oval 0.3x0.8 smd mask+0.05: 7(-1.25,-2) 8(-0.75,-2) 9(-0.25,-2) 10(0.25,-2) 11(0.75,-2) 12(1.25,-2) 19(1.25,2) 20(0.75,2) 21(0.25,2) 22(-0.25,2) 23(-0.75,2) 24(-1.25,2)
  rect 2.8x2.8 smd mask+0.05: 25(0,0)
  silkscreen extent -3.12,-2.45 2.68,2.64, body extent -1.8,-1.8 1.8,1.8, height 0.8
QFN-48 [mm]
  oval 0.9x0.3 smd mask+0.05: 1(-3.45,2.675) 2(-3.45,2.175) 3(-3.45,1.675) 4(-3.45,1.175) 5(-3.45,0.675) 6(-3.45,0.175) 7(-3.45,-0.325) 8(-3.45,-0.825) 9(-3.45,-1.325) 10(-3.45,-1.825) 11(-3.45,-2.325) 12(-3.45,-2.825) 25(3.45,-2.7) 26(3.45,-2.2) 27(3.45,-1.7) 28(3.45,-1.2) 29(3.45,-0.7) 30(3.45,-0.2) 31(3.45,0.3) 32(3.45,0.8) 33(3.45,1.3) 34(3.45,1.8) 35(3.45,2.3) 36(3.45,2.8)
  oval 0.3x0.9 smd mask+0.05: 13(-2.725,-3.45) 14(-2.225,-3.45) 15(-1.725,-3.45) 16(-1.225,-3.45) 17(-0.725,-3.45) 18(-0.225,-3.45) 19(0.275,-3.45) 20(0.775,-3.45) 21(1.275,-3.45) 22(1.775,-3.45) 23(2.275,-3.45) 24(2.775,-3.45) 37(2.75,3.45) 38(2.25,3.45) 39(1.75,3.45) 40(1.25,3.45) 41(0.75,3.45) 42(0.25,3.45) 43(-0.25,3.45) 44(-0.75,3.45) 45(-1.25,3.45) 46(-1.75,3.45) 47(-2.25,3.45) 48(-2.75,3.45)
  rect 5.2x5.2 smd paste-10 mask+0.05: 49(0,0)
  silkscreen extent -4.31,-4.15 4.22,4.39, body extent -3.05,-3.05 3.05,3.05, height 0.9
RES0201 [mm]
  rect 0.28x0.32 smd mask+0.05: 1(-0.23,0) 2(0.23,0)
  silkscreen extent -0.5,-0.3 0.5,0.3, body extent -0.3,-0.15 0.3,0.15, height 0.23
RES0402 [mm]
  rect 0.51x0.54 smd mask+0.05: 1(-0.41,0) 2(0.41,0)
  silkscreen extent -0.85,-0.45 0.85,0.45, body extent -0.5,-0.25 0.5,0.25, height 0.35
RES0603 [mm]
  rect 0.76x0.76 smd mask+0.05: 1(-0.738,0) 2(0.738,0)
  silkscreen extent -1.3,-0.55 1.3,0.55, body extent -0.8,-0.4 0.8,0.4, height 0.46
USB4105-GF-A [mm]
  oval 1x1.8 hole 0.6 slot 1.4 at 90 deg: 25(-4.32,-2.665) 25(4.32,-2.665)
  oval 1x2.1 hole 0.6 slot 1.7 at 90 deg: 25(-4.32,1.515) 25(4.32,1.515)
  rect 0.6x1.15 smd mask+0.05: A1/B12(-3.2,2.665) A4/B9(-2.4,2.665) B1/A12(3.2,2.665) B4/A9(2.4,2.665)
  rect 0.3x1.15 smd mask+0.05: A5(-1.25,2.665) A6(-0.25,2.665) A7(0.25,2.665) A8(1.25,2.665) B5(1.75,2.665) B6(0.75,2.665) B7(-0.75,2.665) B8(-1.75,2.665)
  silkscreen extent -4.42,-5.23 4.5,3.41, body extent -4.44,-5.23 4.5,2.47, height 3.26
VMK4-1EE-12-32K7680000TR [mm]
  rect 1x1.8 smd mask+0.05: 1(-1.273,-0.05) 2(1.227,-0.05)
  silkscreen extent -1.98,-1.15 1.93,1.05, body extent -1.62,-0.8 1.57,0.7, height 0.9
VXM7-1362-50M0000000 [mm]
  rect 1.3x1.1 smd: 1(-1.15,0.95) 2(1.15,0.95) 3(-1.15,-0.95) 4(1.15,-0.95)
  silkscreen extent -2.48,-1.7 2.05,1.68, body extent -1.66,-1.31 1.64,1.28, height 0.81
VXM8-9016-24M0000000 [mm]
  rect 0.575x0.575 smd: 1(-0.85,0.65) 2(0.85,0.65) 3(0.85,-0.65) 4(-0.85,-0.65)
  silkscreen extent -1.56,-1.1 1.33,1.13, body extent -1.33,-1.08 1.31,1.08, height 0.71

## Part data
C1 C3 C7 C13 C14 C15 C16 C17 C19 C20 C21 C22 C23 C24 C25 C26 C27 C28 C31 C34 C37 C39 C48 C49 C50 C51 C52 C56 C59: library part C0402C104K4RAC7867, "CAP CER 0.1uF 16V 10% X7R SMD 0402", Manufacturer=KEMET, Package=0402, Rated Voltage=16V, .Checked_PCB=AI, .Checked_SCH=AI, .Creator=AI, Manufacturer Part Number=C0402C104K4RAC7867
C2 C8 C53 C54: library part QSCF500Q100J1GV001T, "CAP CER 10pF 50V 5% C0G/NP0 SMD 0402", Manufacturer="Johanson Technology", Package=0402, Rated Voltage=50V, .Checked_PCB=AI, .Checked_SCH=AI, .Creator=AI, Manufacturer Part Number=QSCF500Q100J1GV001T
C4 C9 C10 C11 C12 C40 C42 C44 C46 C47: library part C1005X5R1A475K050BC, "CAP CER 4.7uF 10V 10% X5R SMD 0402", Manufacturer="TDK Corporation", Package=0402, Rated Voltage=10V, .Checked_PCB=AI, .Checked_SCH=AI, .Creator=AI, Manufacturer Part Number=C1005X5R1A475K050BC
C5 C6: library part QSCF500Q120J1GV001T, "CAP CER 12pF 50V 5% C0G/NP0 SMD 0402", Manufacturer="Johanson Technology", Package=0402, Rated Voltage=50V, .Checked_PCB=AI, .Checked_SCH=AI, .Creator=AI, Manufacturer Part Number=QSCF500Q120J1GV001T
C18 C58: library part GRM155C71A225KE11J, "CAP CER 2.2uF 10V 10% X7S SMD 0402", Manufacturer=Murata, Package=0402, Rated Voltage=10V, .Checked_PCB=AI, .Checked_SCH=AI, .Creator=AI, Manufacturer Part Number=GRM155C71A225KE11J
C29: library part UWT1E331MNL1GS, "CAP ALU 330uF 25V 20% SMD F", Manufacturer=Nichicon, Rated Voltage=25V, Manufacturer Part Number=UWT1E331MNL1GS
C30 C38: library part GRT188R61C106KE13D, "CAP CER 10uF 16V 10% X5R SMD 0603 AEC-Q200", Manufacturer=Murata, Rated Voltage=16V, .Checked_PCB=IC, .Checked_SCH=IC, .Creator=IC, Manufacturer Part Number=GRT188R61C106KE13D, Pacakage=0603
C32 C33: library part GRM1555C1H471JA01D, "CAP CER 470pF 50V 5% NP0 SMD 0402", Manufacturer=Murata, Package=0402, Rated Voltage=50V, .Checked_PCB=AI, .Checked_SCH=AI, .Creator=AI, Manufacturer Part Number=GRM1555C1H471JA01D
C35: library part GRM32ER61A107ME20L, "CAP CER 100uF 10V 20% X5R SMD 1210", Manufacturer="Murata Electronics North", Package=1210, Rated Voltage=10V, .Checked_PCB=IC, .Checked_SCH=IC, Manufacturer Part Number=GRM32ER61A107ME20L
C36 C41 C43 C45 C57: library part C2012X7S1A226M125AC, "CAP CER 22uF 10V 20% X7S SMD 0805", Manufacturer="TDK Corporation", Package=0805, Rated Voltage=10V, Manufacturer Part Number=C2012X7S1A226M125AC
C55: library part 202R18W102KV4E, "CAP CER 1000pF 2KV 10% X7R SMD 1206", Manufacturer="D3_Johanson Dielectrics Inc", Rated Voltage=2kV, .Checked_PCB=AI, .Checked_SCH=AI, .Creator=AI, Manufacturer Part Number=202R18W102KV4E
D1: library part CLV1A-FKB-CK1VW1DE1BB7C3C3, "DIO LED TRI RED, GREEN, BLUE 2V, 3.2V, 3.2V 20mA, 20mA,  / 20mA SMD 4-PLCC", Manufacturer="Cree Inc.", .Checked_PCB=IC, .Checked_SCH=IC, Manufacturer Part Number=CLV1A-FKB-CK1VW1DE1BB7C3C3
FB1 FB2 FB3 FB4 FB5 FB6 FB7 FB8: library part BLM18PG121SN1D, "FERRITE BEAD 120 OHM 0603 1LN", Manufacturer=Murata, .Checked_PCB=AI, .Checked_SCH=AI, .Creator=AI
  FB5 FB6 FB7 FB8: Manufacturer Part Number=BLM18PG121SN1D
J1: library part USB4105-GF-A, "CONN USB2.0 TYPE-C Female SMD/TH R/A", Manufacturer=GCT, Manufacturer Part Number=USB4105-GF-A
J2: library part 292303-1, "CON USB2.0 STD-A FEMALE TH R/A", Manufacturer="TE Connectivity AMP", Manufacturer Part Number=292303-1
J3: "CON MODULAR JACK RJ45 10/100/1000 MAGNETICS 2xLEDs  / SHIELD TH R/A", Manufacturer="Pulse Electronics", Manufacturer Part Number=JXD1-0019NL
J4: "CON FLASH microSD 8+2P Push-Push SMD", Manufacturer="Hirose Electric Co Ltd", Manufacturer Part Number=DM3AT-SF-PEJM5
J5: library part 1-1734248-5, "CON FPC 1mm 15P Female SMD VERT", Manufacturer="TE Connectivity AMP", Manufacturer Part Number=1-1734248-5
J6: library part 68001-106HLF, "CON HDR-2.54 Male 1x6 Gold 5.84MH TH VERT", Manufacturer=FCI, Manufacturer Part Number=68001-106HLF
L1 L2 L3: library part DFE252012P-1R5M=P2, "INDUCTOR 1.5uH 3.5A 20% SMD 1008", Manufacturer="Murata Electronics North", Manufacturer Part Number=DFE252012P-1R5M=P2, .Checked_PCB=AI, .Checked_SCH=AI, .Creator=AI
R1 R14 R16 R17 R22 R23 R24 R26 R27 R28 R29 R30 R31 R42: library part ERJ-2RKF1002X, "RES TKF 10k 1% 1/10W SMD 0402", Manufacturer=Panasonic, Package=0402, Tolerance=1%, Manufacturer Part Number=ERJ-2RKF1002X
R2 R3 R4: library part CR0201-FW-2000GLF, "RES TKF 200R 1% 1/20W SMD 0201", Manufacturer="Bourns Inc.", Package=0201, Tolerance=1%, Manufacturer Part Number=CR0201-FW-2000GLF
R5 R6 R7 R8: library part ERJ-1GNF1692C, "RES TKF 16.9k 1% 1/20W SMD 0201", Manufacturer="Panasonic Electronic", Package=0201, Tolerance=1%, Manufacturer Part Number=ERJ-1GNF1692C
R9: library part RC0201FR-074K02L, "RES TKF 4.02k 1% 1/20W SMD 0201", Manufacturer=Yageo, Package=0201, Tolerance=1%, Manufacturer Part Number=RC0201FR-074K02L
R10 R11 R25 R32 R33 R34 R35 R45 R46 R47: library part ERJ-2RKF1001X, "RES TKF 1k 1% 1/10W SMD 0402", Manufacturer=Panasonic, Package=0402, Tolerance=1%, Manufacturer Part Number=ERJ-2RKF1001X
R12 R13: library part RC0201FR-07240RL, "RES TKF 240R 1% 1/20W SMD 0201", Manufacturer=Yageo, Package=0201, Tolerance=1%, Manufacturer Part Number=RC0201FR-07240RL
R15: library part RMCF0402FT20K0, "RES TKF 20k 1% 1/10W SMD 0402", Manufacturer="Stackpole Electronics Inc", Package=0402, Tolerance=1%, Manufacturer Part Number=RMCF0402FT20K0
R18 R19 R37 R38 R39 R40 R41: library part ERJ-2RKF4702X, "RES TKF 47k 1% 1/10W SMD 0402 AEC-Q200", Manufacturer="Panasonic - ECG", Package=0402, Tolerance=1%, Manufacturer Part Number=ERJ-2RKF4702X
R20 R21: library part ERJ-3EKF3300V, "RES TKF 330R 1% 1/10W SMD 0603", Manufacturer=Panasonic, Package=0603, Tolerance=1%, .Checked_PCB=IC, .Checked_SCH=IC, .Creator=IC, Manufacturer Part Number=ERJ-3EKF3300V
R36: library part ERJ-2RKF6041X, "RES TKF 6.04k 1% 1/10W SMD 0402 AEC-Q200", Manufacturer="Panasonic Electronic", Package=0402, Tolerance=1%, Manufacturer Part Number=ERJ-2RKF6041X
R43 R44: library part ERJ-2RKF2201X, "RES TKF 2.2k 1% 1/10W SMD 0402", Manufacturer=Panasonic, Package=0402, Tolerance=1%, Manufacturer Part Number=ERJ-2RKF2201X
SW1 SW2: "SWITCH TACT SPST 12V 50mA PTS 647 SK38 SMTR2 LFSSMD", Arrow Part Number="PTS 647 SK38 SMTR2 LFS", Manufacturer=C&K, Arrow Price/Stock=https://www.arrow.com/en/products/pts-647-sk38-smtr2-lfs/ck?region=europe, Datasheet Link=https://datasheet.datasheetarchive.com/originals/distributors/Datasheets_SAMA/dda6c2a9a64375c9ffe9508ecade46cd.pdf, Height=3.8mm, Manufacturer Part Number="PTS 647 SK38 SMTR2 LFS"
U1: "MCHP MPU SiP 32-BIT Cortex-A7 1000MHz 128kB 2Gbit  / SAMA7G54D2G-I/4UB LFBGA-427", Manufacturer="Microchip Technology", Manufacturer Part Number=SAMA7G54DG-I/4UB
U2: "MCHP ANALOG PMIC SWITCHER Buck ADJ MCP16501TA-E/RMB  / QFN-24", Manufacturer="Microchip Technology", Manufacturer Part Number=MCP16501TA-E/RMB
U3: "MCHP INTERFACE ETHERNET LAN8840 QFN-48", Manufacturer="Microchip Technology", Manufacturer Part Number=LAN8840-V/PSA
Y1: library part VMK4-1EE-12-32K7680000TR, "MCHP CRYSTAL 32.768kHz 12.5pF VMK4-1EE-12-32K7680000TR  / SMD L2.0W1.2H0.5", Manufacturer="Microchip Technology", Manufacturer Part Number=VMK4-1EE-12-32K7680000TR
Y2: library part VXM8-9016-24M0000000, "MCHP CRYSTAL 24MHz 10pF VXM8-9016-24M000000 SMD  / L2.5W2H0.55", Manufacturer="Microchip Technology", Manufacturer Part Number=VXM8-9016-24M0000000
Y3: library part VXM7-1362-50M0000000, "MCHP CRYSTAL 50MHz VXM7-1362-50M0000000 SMD  / L3.2W2.5H0.8", Manufacturer="Microchip Technology", Manufacturer Part Number=VXM7-1362-50M0000000

## Free pads (board coordinates)
  round 6 hole 3.2: ""(3.5,3.5) ""(3.5,52.5) ""(61.5,3.5) ""(61.5,52.5)

## Via types
v1: diameter 0.45, hole 0.2, Top Layer to Bottom Layer, 177 vias
v2: diameter 0.6, hole 0.3, Top Layer to Bottom Layer, 161 vias
v3: diameter 0.45, hole 0.2, Top Layer to L2_GND, 59 vias
v4: diameter 0.5, hole 0.3, Top Layer to Bottom Layer, tented both sides, 34 vias
v5: diameter 0.6, hole 0.3, Top Layer to L2_GND, 2 vias

## Nets (pads, with @x,y where several pads share a name; then routed paths per layer and width w, separated by ;. In a path a pad name is that pad's centre, name@x,y a point inside that pad or via, vN(x,y) a via of type N, cw(c..) or ccw(c..) an arc to the next point about the centre after c; other vN are vias at no path point)
5V_MAIN: C29.1 C30.2 C31.2 C38.2 C40.2 C42.2 C44.2 C46.2 FB1.2 FB3.2 U2.7 U2.12 U2.17 U2.21 U2.24 | length 13.8
  Top Layer w0.3: v2(5.525,25.975) 5.55,25.95 U2.21@7,25.95 ; C31.2@9.456,5.971 10.971,5.971 v2(11,6) ; C30.2@9.72,7.4 v2(10.9,7.4) ; v2(12.3,10.7) 12.35,10.75 C29.1@12.35,12.525 ; v2(12.35,13.95) C29.1@12.35,12.525 ; v2(15,12.6) 12.425,12.6 C29.1@12.35,12.525
  Bottom Layer w0.3: v2(20.45,3.45) FB1.2@20.45,4.65 FB1.2@20.45,4.95
  Bottom Layer w0.5: C38.2@82.4,18.16 82.46,18.1 v2(83.5,18.1) ; FB3.2@82.5,16.8 82.56,16.74 v2(83.44,16.74)
  other v2: 6.6,22.7 10.8,23.1 7.1,23.3 11.4,23.5 6.6,23.8 10.9,24.1 10.9,27.3 11.5,27.7 10.9,28.3 8.198,29.388 8.978,29.393
CAM_GPIO0: J5.11 U1.T18 | length 19.3
  Top Layer w0.1: J5.11@42.178,49.272 J5.11@42.178,53.023
  Top Layer w0.15: U1.T18@37.6,36.2 v1(38,36.6) ; J5.11@42.178,49.272 42.2,49.25 v2(42.2,47.7)
  Bottom Layer w0.15: v1(38,36.6) 39.2,37.8 40.1,37.8 40.4,38.1 40.4,43.3 42.2,45.1 v2(42.2,47.7)
CAM_GPIO1: J5.12 U1.R21 | length 16.3
  Top Layer w0.1: J5.12@41.178,49.272 J5.12@41.178,53.023
  Top Layer w0.15: U1.R21@36.8,38.6 v1(37.2,39) ; J5.12@41.178,49.272 41.2,49.25 v2(41.2,47.7)
  Bottom Layer w0.15: v1(37.2,39) 37.2,41.4 41.2,45.4 v2(41.2,47.7)
CAM_TWCK: J5.13 R43.2 U1.D11 | length 32
  Top Layer w0.15: v1(27.6,30.2) U1.D11@28,30.6 ; v2(39.4,45.3) 40.178,46.078 J5.13@40.178,49.272 J5.13@40.178,53.023
  L4-SGN w0.15: v1(27.6,30.2) 27.4,30.4 27.4,31.3 29,32.9 32.4,32.9 32.9,33.4 32.9,38.3 33.895,39.295 34.595,39.295 37,41.7 37,43 39.3,45.3 v2(39.4,45.3)
  Bottom Layer w0.15: v1(27.6,30.2) R43.2@27.6,31
CAM_TWD: J5.14 R44.2 U1.A3 | length 38.1
  Top Layer w0.15: v1(25.2,23.8) U1.A3@25.6,24.2 ; R44.2@39.01,54.8 39.178,54.632 J5.14@39.178,53.023 J5.14@39.178,49.272 39.1,49.195 v2(39.1,47.5)
  Bottom Layer w0.15: v1(25.2,23.8) 27.8,26.4 28.8,26.4 33.1,30.7 33.1,37.3 35.758,39.958 35.948,39.958 36.05,40.06 36.05,40.25 36.75,40.95 36.75,41.586 37.2,42.036 37.2,45.6 v2(39.1,47.5)
DBGU_RX: J6.4 U1.J20 | length 22.2
  Top Layer w0.15: J6.4@16.73,52.5 21.43,47.8 23.4,47.8 v2(27.4,43.8) ; v1(31.6,38.2) U1.J20@32,37.8
  Bottom Layer w0.15: v2(27.4,43.8) 29.3,41.9 31.6,39.6 v1(31.6,38.2)
DBGU_TX: J6.5 U1.G25 | length 20.9
  Top Layer w0.15: v1(30,42.2) U1.G25@30.4,41.8
  Bottom Layer w0.15: J6.5@14.19,52.5 18.79,47.9 24.7,47.9 30,42.6 v1(30,42.2)
DDR_VREF: C3.1 C7.2 R10.1 R11.2 U1.E4 U1.R12 | length 28.6
  Top Layer w0.3: v1(28.4,24.6) U1.E4@28.8,25 ; v2(33.2,21.3) 33.2,20.59 R10.1@33.29,20.5 33.29,19.41 C3.1@33.28,19.4 33.28,18.92 33.6,18.6 34.8,18.6 35.18,18.98 C7.2@35.18,19.4 35.18,20.49 R11.2@35.19,20.5 ; U1.R12@36.8,31.4 v1(37.2,31)
  Bottom Layer w0.3: v1(28.4,24.6) 27.8,24 27.8,22.3 28.4,21.7 32.8,21.7 v2(33.2,21.3) 34.7,21.3 35.7,22.3 35.7,23.2 36.1,23.6 36.1,25.028 35.925,25.203 35.925,25.825 37.2,27.1 37.2,27.9 36.5,28.6 36.5,29.3 37.2,30 v1(37.2,31)
ETH_ISET: R36.2 U3.48 | length 2.3
  Top Layer w0.15: U3.48@59.75,36.55 R36.2@61.96,36.55
  Top Layer w0.3: R36.2@61.96,36.55 R36.2@62,36.51
GMAC0_IRQ: R26.1 U1.F15 U3.39 | length 45.4
  Top Layer w0.15: v1(29.2,34.2) U1.F15@29.6,33.8 ; U3.39@55.25,36.55 55.3,36.5 v2@55.3,35.375
  L4-SGN w0.15: v1(29.2,34.2) 30.2,35.2 30.2,36.7 30.7,37.2 30.7,37.5 30,38.2 30,38.9 31.6,40.5 33,40.5 38.8,46.3 50.8,46.3 54.4,42.7 54.4,36.1 55.2,35.3 55.3,35.3 v2(55.3,35.375)
  Bottom Layer w0.15: R26.1@55.2,34.21 55.3,34.31 55.3,35.3 v2(55.3,35.375)
GMAC0_MDC: U1.AA13 U3.37 | length 17.4
  Top Layer w0.15: U1.AA13@41.6,32.2 v1(42,32.6) ; v2(54.1,32.3) 53.8,32.6 53.8,36.1 U3.37@54.25,36.55
  L4-SGN w0.15: v1(42,32.6) 42.04,32.64 51.152,32.64 51.76,32.64 52.13,32.27 54.07,32.27 v2(54.1,32.3)
GMAC0_MDIO: R25.1 U1.W15 U3.38 | length 17.9
  Top Layer w0.15: U1.W15@40,33.8 v1(40.4,34.2) ; v2(50.2,34.6) 52,34.6 52.7,35.3 v2(52.7,35.4) ; v2(54.5,35.3) 54.75,35.55 U3.38@54.75,36.55
  Bottom Layer w0.15: v1(40.4,34.2) 40.8,34.6 v2(50.2,34.6) ; v2(52.7,35.4) 54.4,35.4 v2(54.5,35.3) 54.5,35 54.1,34.6 R25.1@54.1,34.21
GMAC0_RX0: R32.2 U1.U17 U3.33 | length 18.7
  Top Layer w0.15: U1.U17@38.403,35.407 v1@38.803,35.807 ; v2(44.9,36.5) 49.6,36.5 v2(51.6,38.5) 52.192,38.5 52.342,38.65 53.5,38.65 U3.33@53.55,38.7
  L4-SGN w0.15: v1(38.8,35.8) 39.5,36.5 v2@44.806,36.5
  Bottom Layer w0.15: v2(51.6,38.5) 52.7,38.5 53.3,37.9 R32.2@53.58,37.9
GMAC0_RX1: R33.2 U1.AA12 U3.32 | length 22
  Top Layer w0.15: U1.AA12@41.6,31.4 v1(42,31.8) ; v2(52,39.3) 53.45,39.3 U3.32@53.55,39.2
  L4-SGN w0.15: v1(42,31.8) 51.4,31.8 51.4,32.021 v2(51.368,32.021)
  Bottom Layer w0.15: v2(51.368,32.021) 51.368,32.043 51.368,32.89 51.354,32.904 51.354,33.38 51.354,37.546 50.8,38.1 50.8,38.9 51.2,39.3 v2(52,39.3) 53.18,39.3 R33.2@53.58,38.9
GMAC0_RX2: R34.2 U1.T17 U3.30 | length 21.1
  Top Layer w0.15: U1.T17@37.603,35.407 v1(38.003,35.807) ; v2(45.1,37.3) 49,37.3 51.8,40.1 v2(52.019,40.1) 53.45,40.1 U3.30@53.55,40.2
  L4-SGN w0.15: v1(38.003,35.807) 37.4,36.411 37.4,36.9 37.6,37.1 39.316,37.1 39.434,36.982 39.766,36.982 40.084,37.3 v2(45.1,37.3)
  Bottom Layer w0.15: v2(52.019,40.1) v2@52.019,40.083 ; R34.2@53.59,40 52.1,40 v2@52.018,40.082 ; v2@52.018,40.082 v2@52.019,40.083
GMAC0_RX3: R22.1 U1.AA16 U3.29 | length 19.3
  Top Layer w0.15: U1.AA16@41.588,34.607 41.6,34.607 41.607,34.607 42.1,35.1 v1(42.1,35.225) ; v2(52,40.9) 52.175,40.725 52.953,40.725 52.978,40.7 U3.29@53.55,40.7
  L4-SGN w0.15: v1(42.1,35.225) 42.275,35.4 v2(50.7,35.4)
  Bottom Layer w0.15: v2(50.7,35.4) 50.7,37.3 50.2,37.8 50.2,39.092 51.128,40.02 51.128,40.041 51.573,40.486 51.762,40.675 52,40.675 v2(52,40.9) 52.2,41.1 R22.1@53.48,41.1
GMAC0_RXCK: R23.1 U1.Y14 U3.36 | length 17.2
  Top Layer w0.15: U1.Y14@40.8,33 v1(41.2,33.4) ; v2(52.791,33.712) 53.243,34.165 53.243,35.13 53.275,35.162 53.275,35.638 53.243,35.67 53.243,36.893 U3.36@53.55,37.2
  L4-SGN w0.15: v1(41.2,33.4) 41.364,33.4 41.664,33.7 51.645,33.7 51.705,33.76 52.182,33.76 52.242,33.7 v2@52.74,33.7
  Bottom Layer w0.15: v2(52.791,33.712) 52.791,32.796 R23.1@52.907,32.68
GMAC0_RXCTL: R35.2 U1.Y13 U3.34 | length 20.1
  Top Layer w0.15: U1.Y13@40.8,32.2 v1(41.2,32.6) ; v2(52,36.7) 52,37.672 52.528,38.2 U3.34@53.55,38.2
  L4-SGN w0.15: v1(41.2,32.6) 41.69,33.09 41.783,33.09 41.793,33.1 42.207,33.1 42.217,33.09 51.9,33.09 51.929,33.119 51.929,33.142 51.944,33.156 v2(51.944,33.185)
  Bottom Layer w0.15: v2(51.944,33.185) 51.969,33.159 52,33.19 v2(52,36.7) R35.2@54.19,36.7
GMAC0_TX0: U1.Y15 U3.19 | length 30
  Top Layer w0.15: U1.Y15@40.8,33.8 41.15,34.15 v1(41.2,34.1) ; v2(56.4,46) 56.4,44.9 56.725,44.575 U3.19@56.725,43.45
  L4-SGN w0.15: v1(41.2,34.1) 41.2,34.2 51.509,34.2 51.519,34.21 52.21,34.21 52.8,34.8 56.3,34.8 56.5,35 56.5,44.8 56.4,44.9 v2(56.4,46)
GMAC0_TX1: U1.W13 U3.20 | length 39
  Top Layer w0.15: U1.W13@40,32.2 v1(40.4,32.6) ; v2(55.7,47.2) 55.7,44.964 56.225,44.439 U3.20@56.225,43.45
  L4-SGN w0.15: v1(40.4,32.6) 41.8,31.2 52.171,31.2 52.771,30.6 v2(56.3,30.6)
  Bottom Layer w0.15: v2(55.7,47.2) 55.7,44.936 57.05,43.586 57.05,43.55 57.3,43.3 57.3,42.6 57.425,42.475 57.425,41.824 57.425,40.824 57.425,40.359 57.425,40.176 57.425,39.824 57.425,39.176 57.425,38.824 57.425,38.176 57.425,37.5 57.425,31.725 v2(56.3,30.6)
GMAC0_TX2: U1.AA14 U3.21 | length 35.9
  Top Layer w0.15: U1.AA14@41.6,33 41.9,33.3 47,33.3 50.2,30.1 v2(55.495,30.1) ; v2(55.125,46.3) 55.25,46.3 55.25,44.777 55.725,44.302 U3.21@55.725,43.45
  Bottom Layer w0.15: v2(55.125,46.3) 55.125,45.688 55.125,45.112 55.125,44.875 56.6,43.4 56.6,42.201 56.575,42.176 56.575,41.824 56.6,41.799 56.6,41.201 56.575,41.176 56.575,40.824 56.6,40.799 56.6,40.201 56.575,40.176 56.575,39.824 56.6,39.799 56.6,39.201 56.575,39.176 56.575,38.824 56.6,38.799 56.6,38.201 56.575,38.176 56.575,37.824 56.6,37.799 56.6,31.7 56.075,31.175 56.062,31.175 55.725,30.838 55.725,30.825 55.495,30.595 v2(55.495,30.1)
GMAC0_TX3: U1.AA15 U3.22 | length 31.9
  Top Layer w0.15: U1.AA15@41.6,33.8 49.6,33.8 50.8,32.6 52.4,32.6 53.6,31.4 v2(55.2,31.4) ; v2(54.4,45.4) 54.4,44.9 55.225,44.075 U3.22@55.225,43.45
  Bottom Layer w0.15: v2(54.4,45.4) 54.4,44.5 55.5,43.4 55.5,37.3 56,36.8 56,32.2 v2(55.2,31.4)
GMAC0_TXEN: U1.V15 U3.26 | length 26.4
  Top Layer w0.15: U1.V15@39.2,33.8 v1(39.604,34.204) ; v2(51.8,43.3) 51.8,42.5 52.1,42.2 U3.26@53.55,42.2
  L4-SGN w0.15: v1(39.604,34.204) 37.896,34.204 36.6,35.5 36.6,37.6 36.782,37.782 37.384,37.782 41.782,37.782 47.3,43.3 v2(51.8,43.3)
GMACH0_TXCK: U1.Y17 U3.25 | length 17.3
  Top Layer w0.15: U1.Y17@40.8,35.4 v1(41.2,35.8) ; v1(52.5,42.7) U3.25@53.55,42.7
  L4-SGN w0.15: v1(41.2,35.8) 41.3,35.8 41.35,35.85 47.4,35.85 48.9,37.35 48.9,39.9 49.025,40.025 49.025,40.038 49.362,40.375 49.375,40.375 51.7,42.7 v1(52.5,42.7)